# Altium PCB PCB1.PcbDoc (part 1 of 3)
Units mm, origin at the board's own origin, x right, y up, seen from the top; angles counter-clockwise.
Board outline 161.54 x 169.48 mm, 4 copper layers (Top Layer, Layer 1, Layer 2, Bottom Layer), stack 0.603 mm thick; 181 components, 244 nets, 1695 pads, 188 vias.
Unrouted connection lines stored in the file: 630.
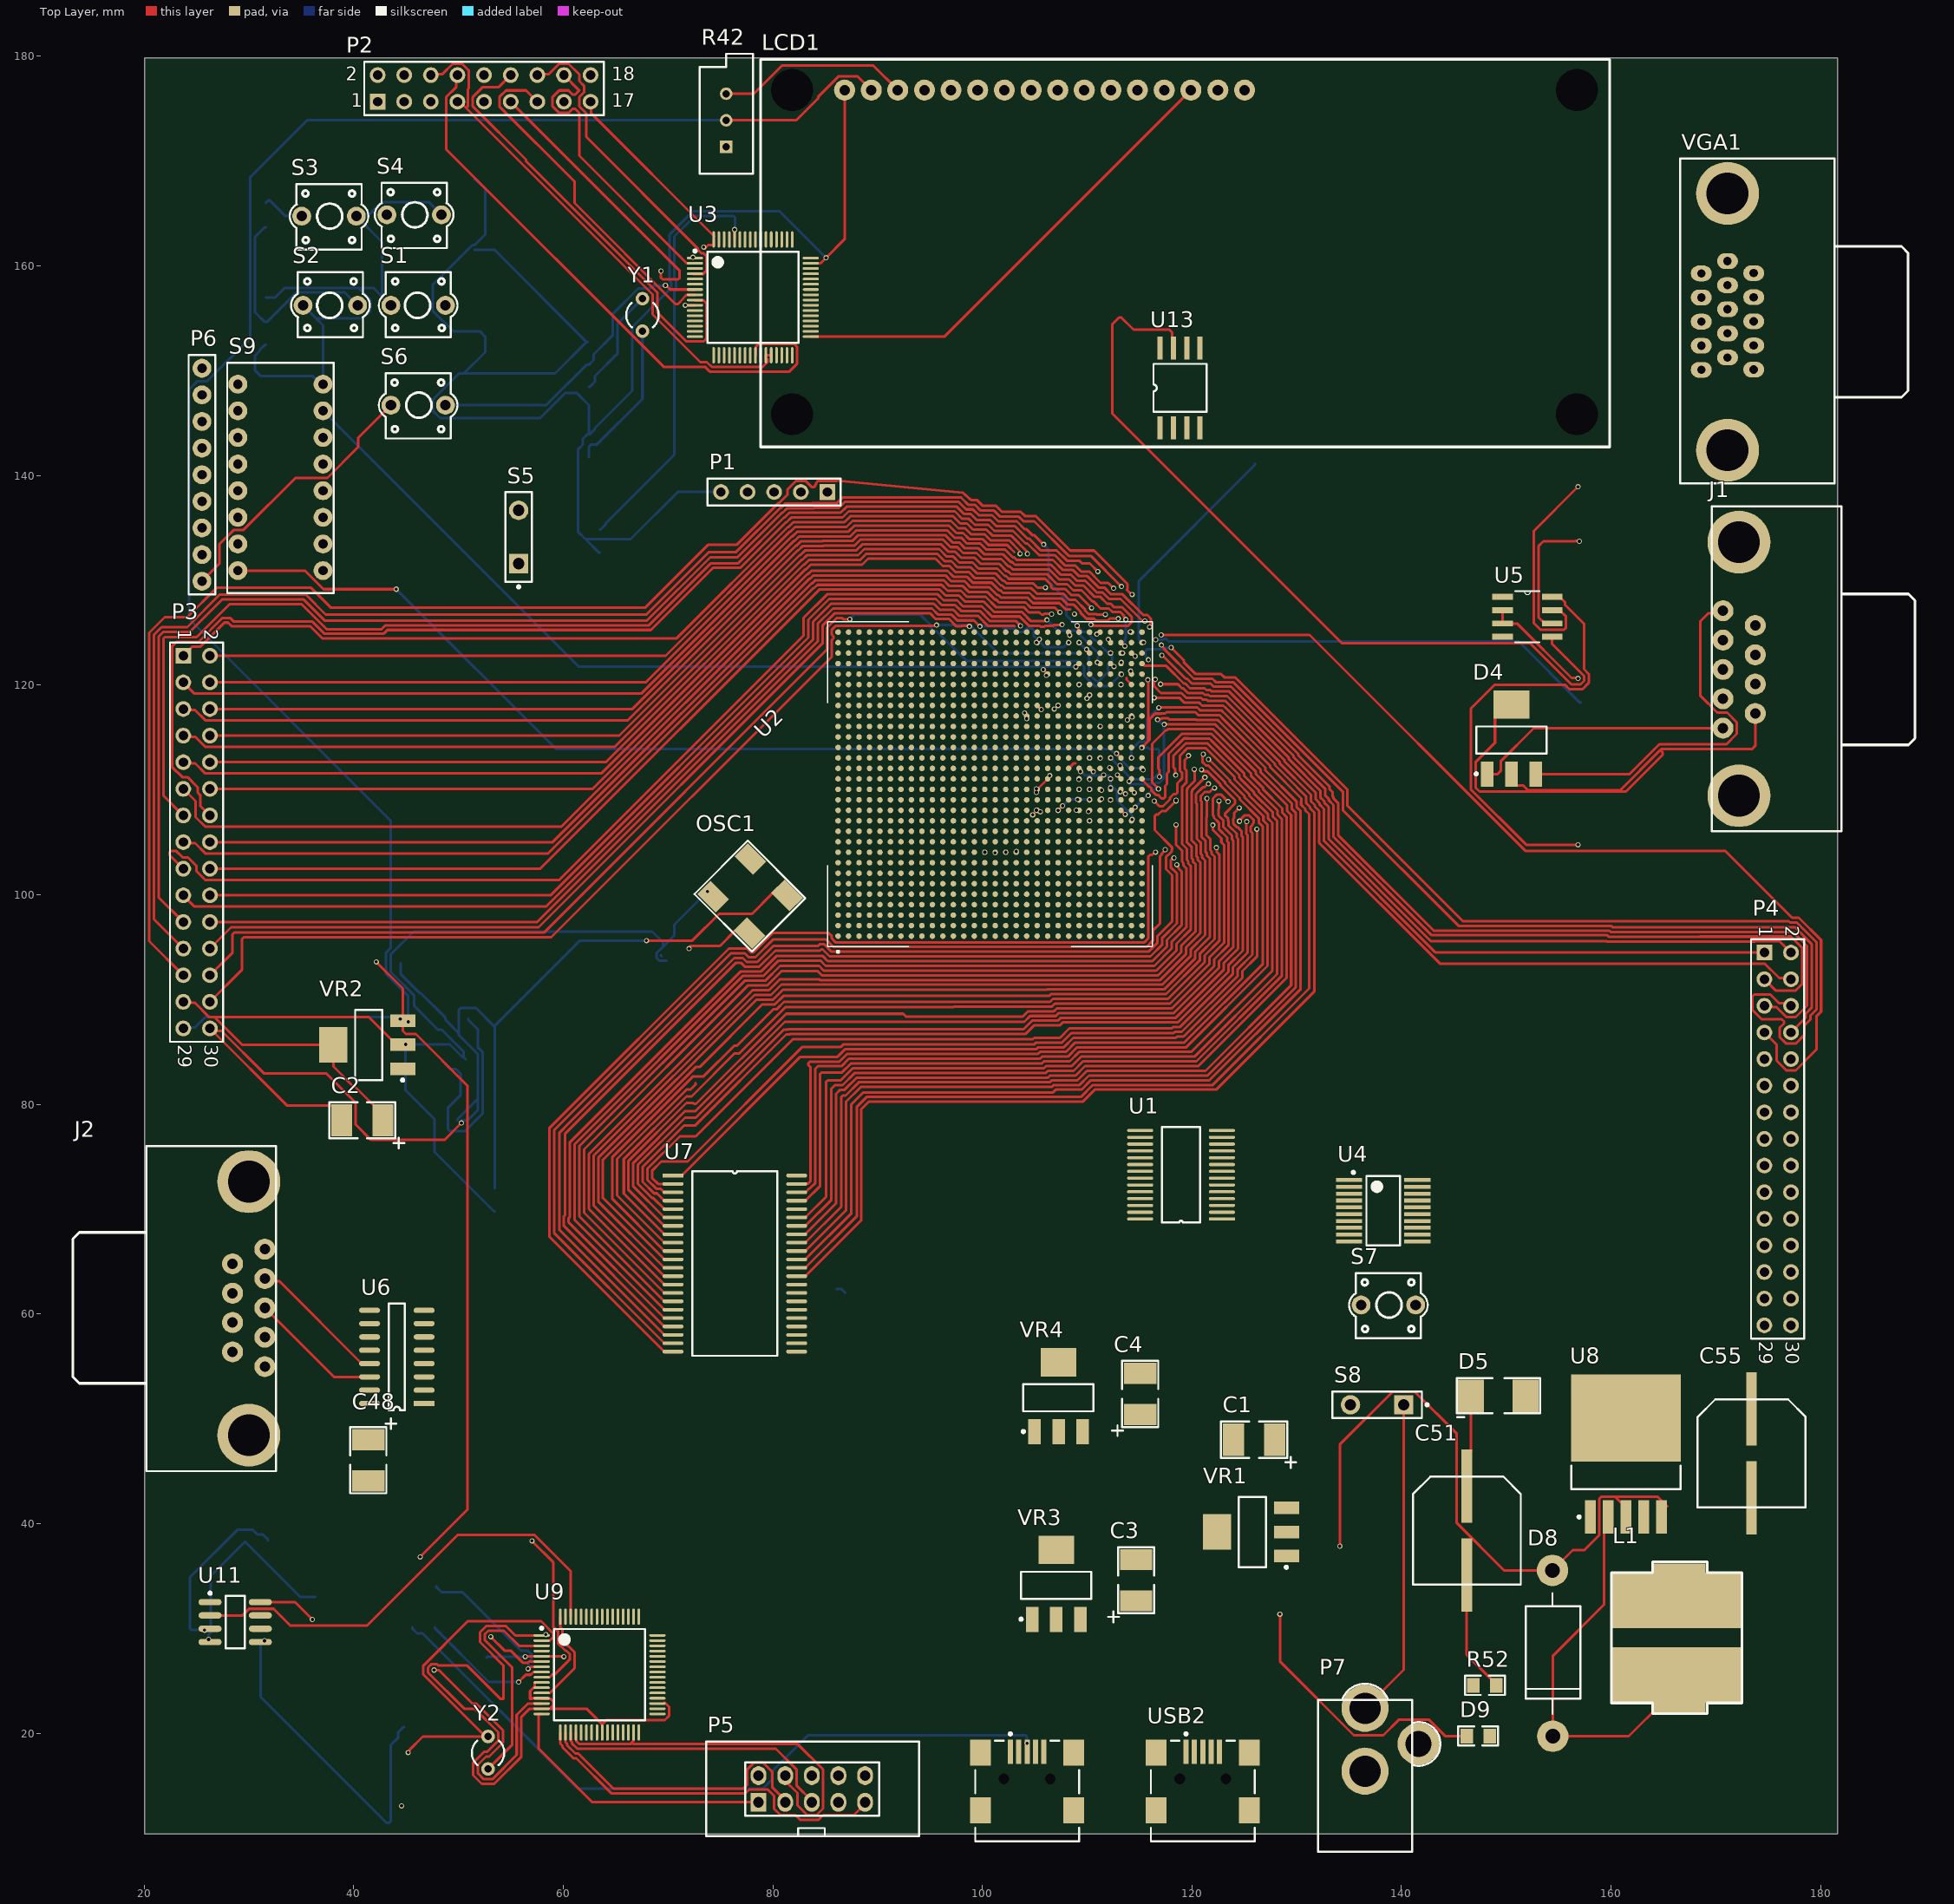
[diagram p0: Top Layer view]
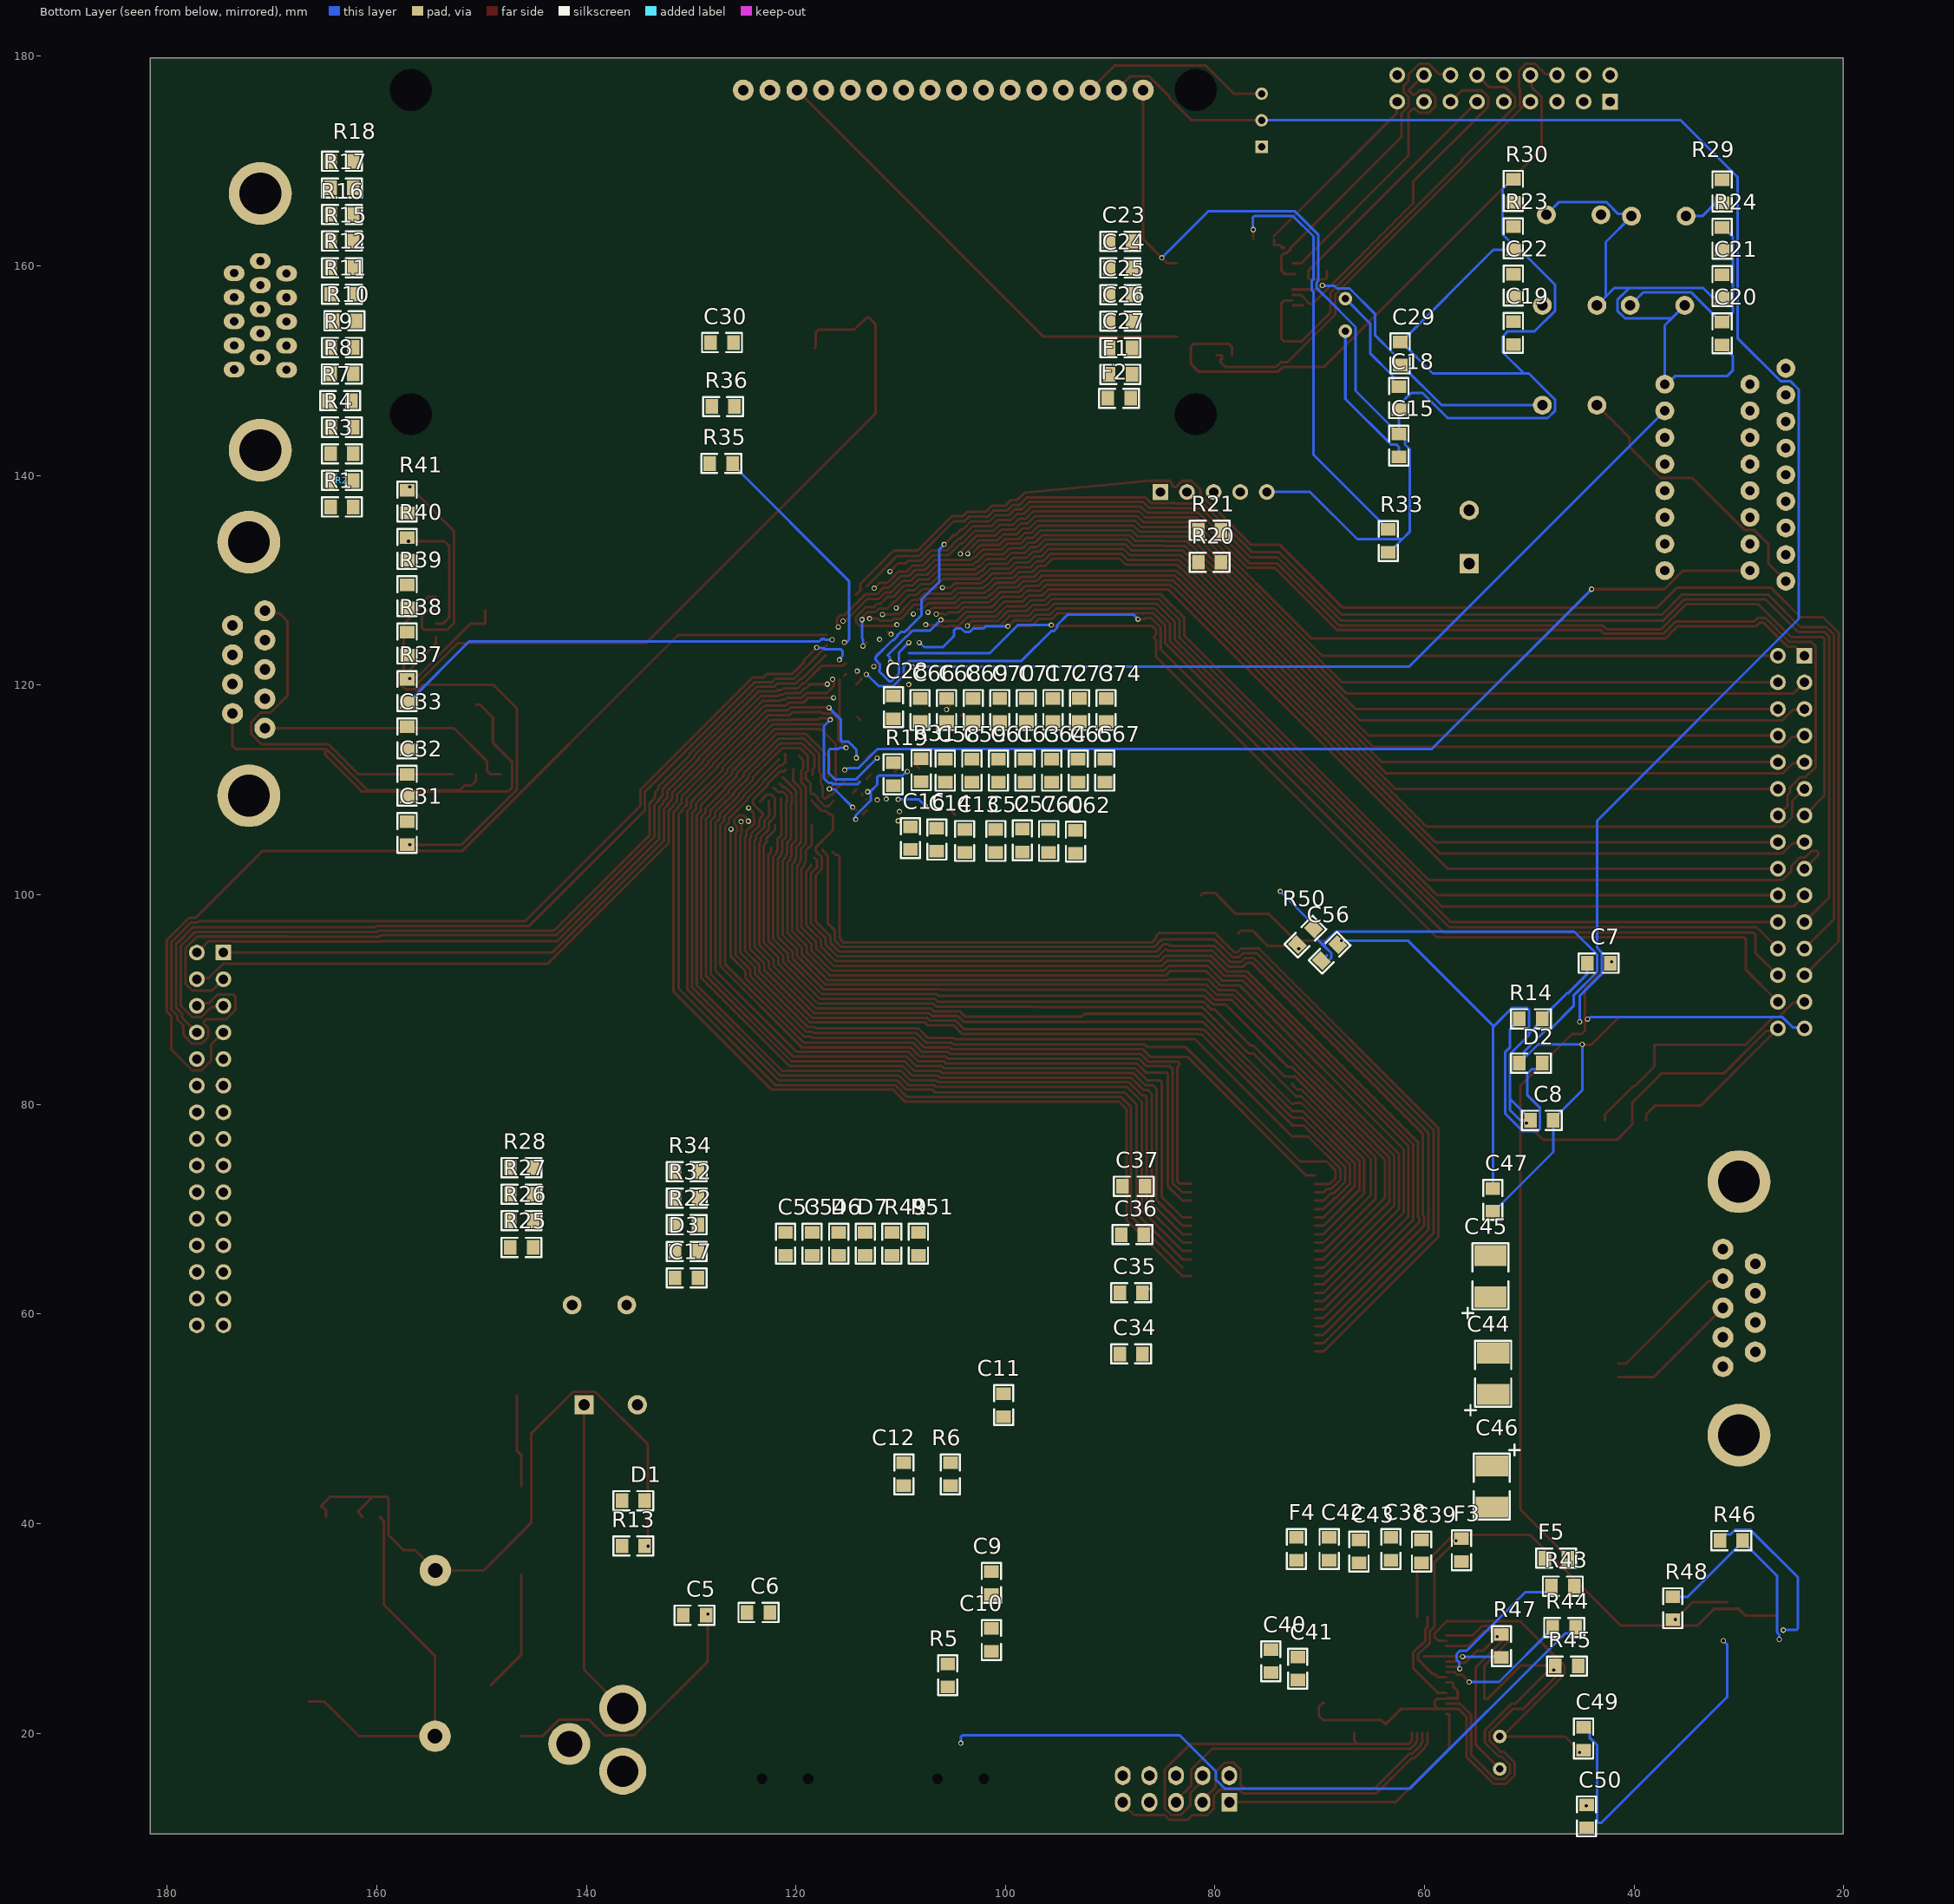
[diagram p1: Bottom Layer view, seen from below]
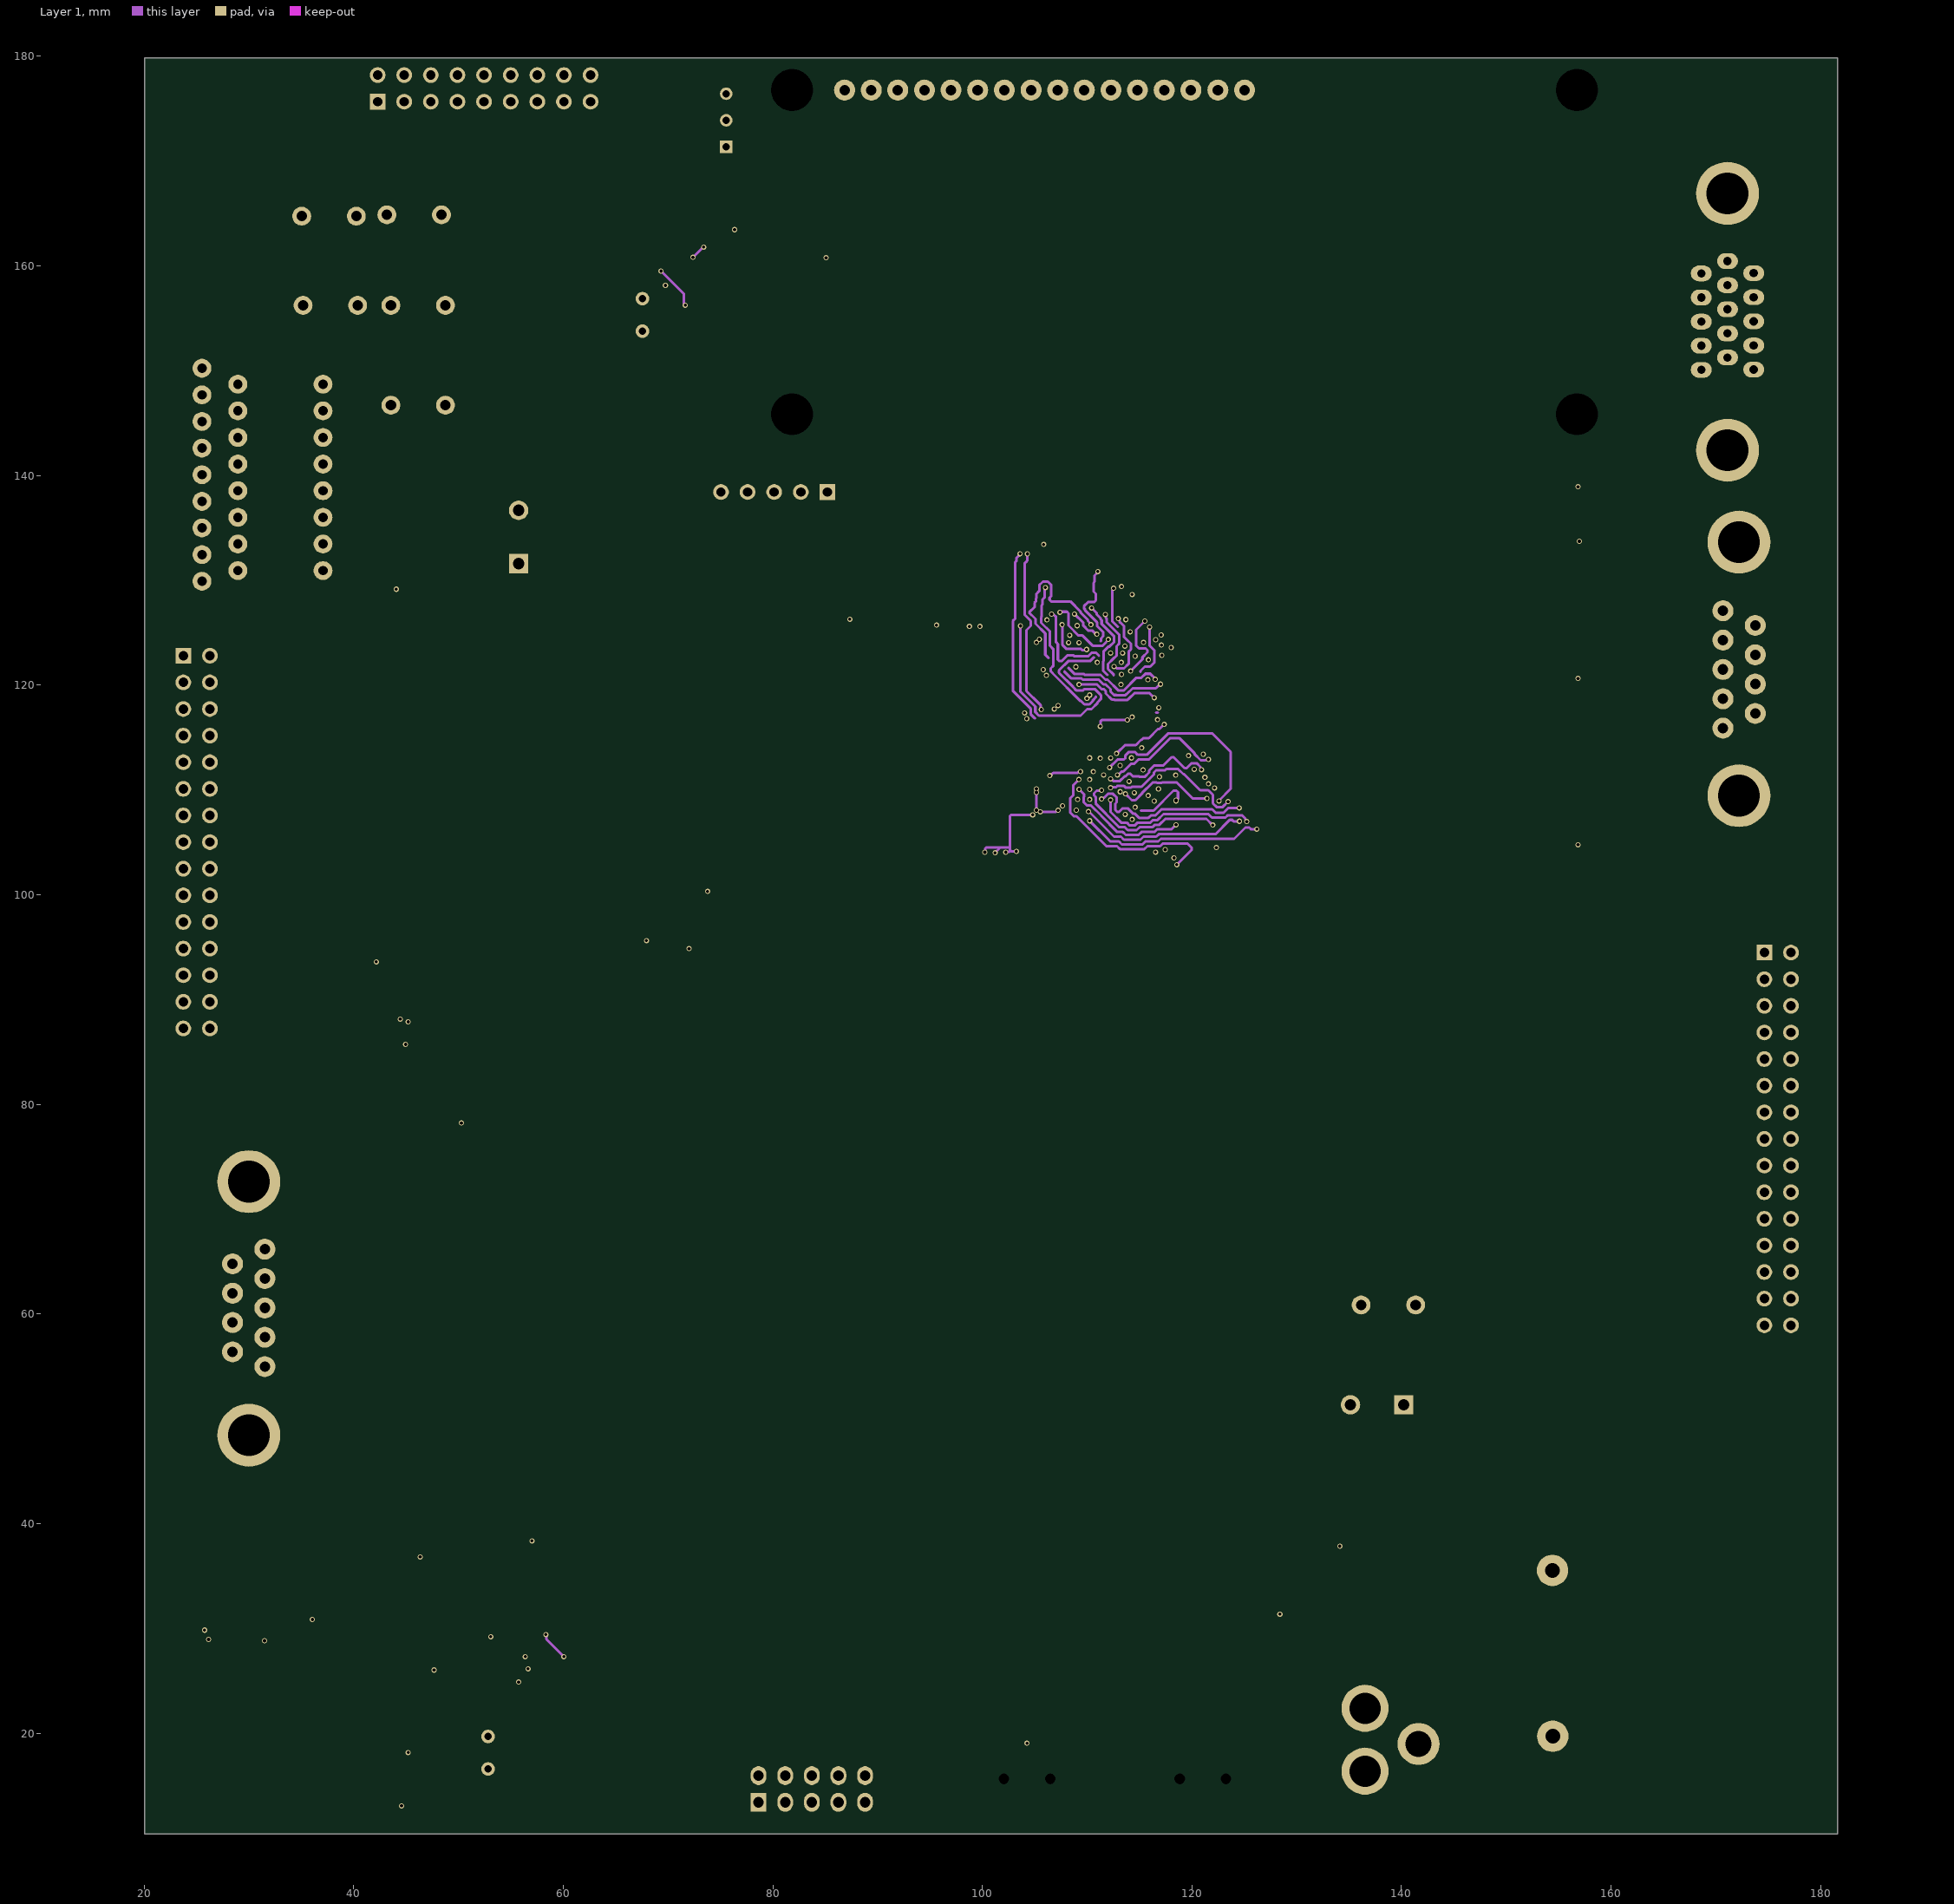
[diagram p2: Layer 1]
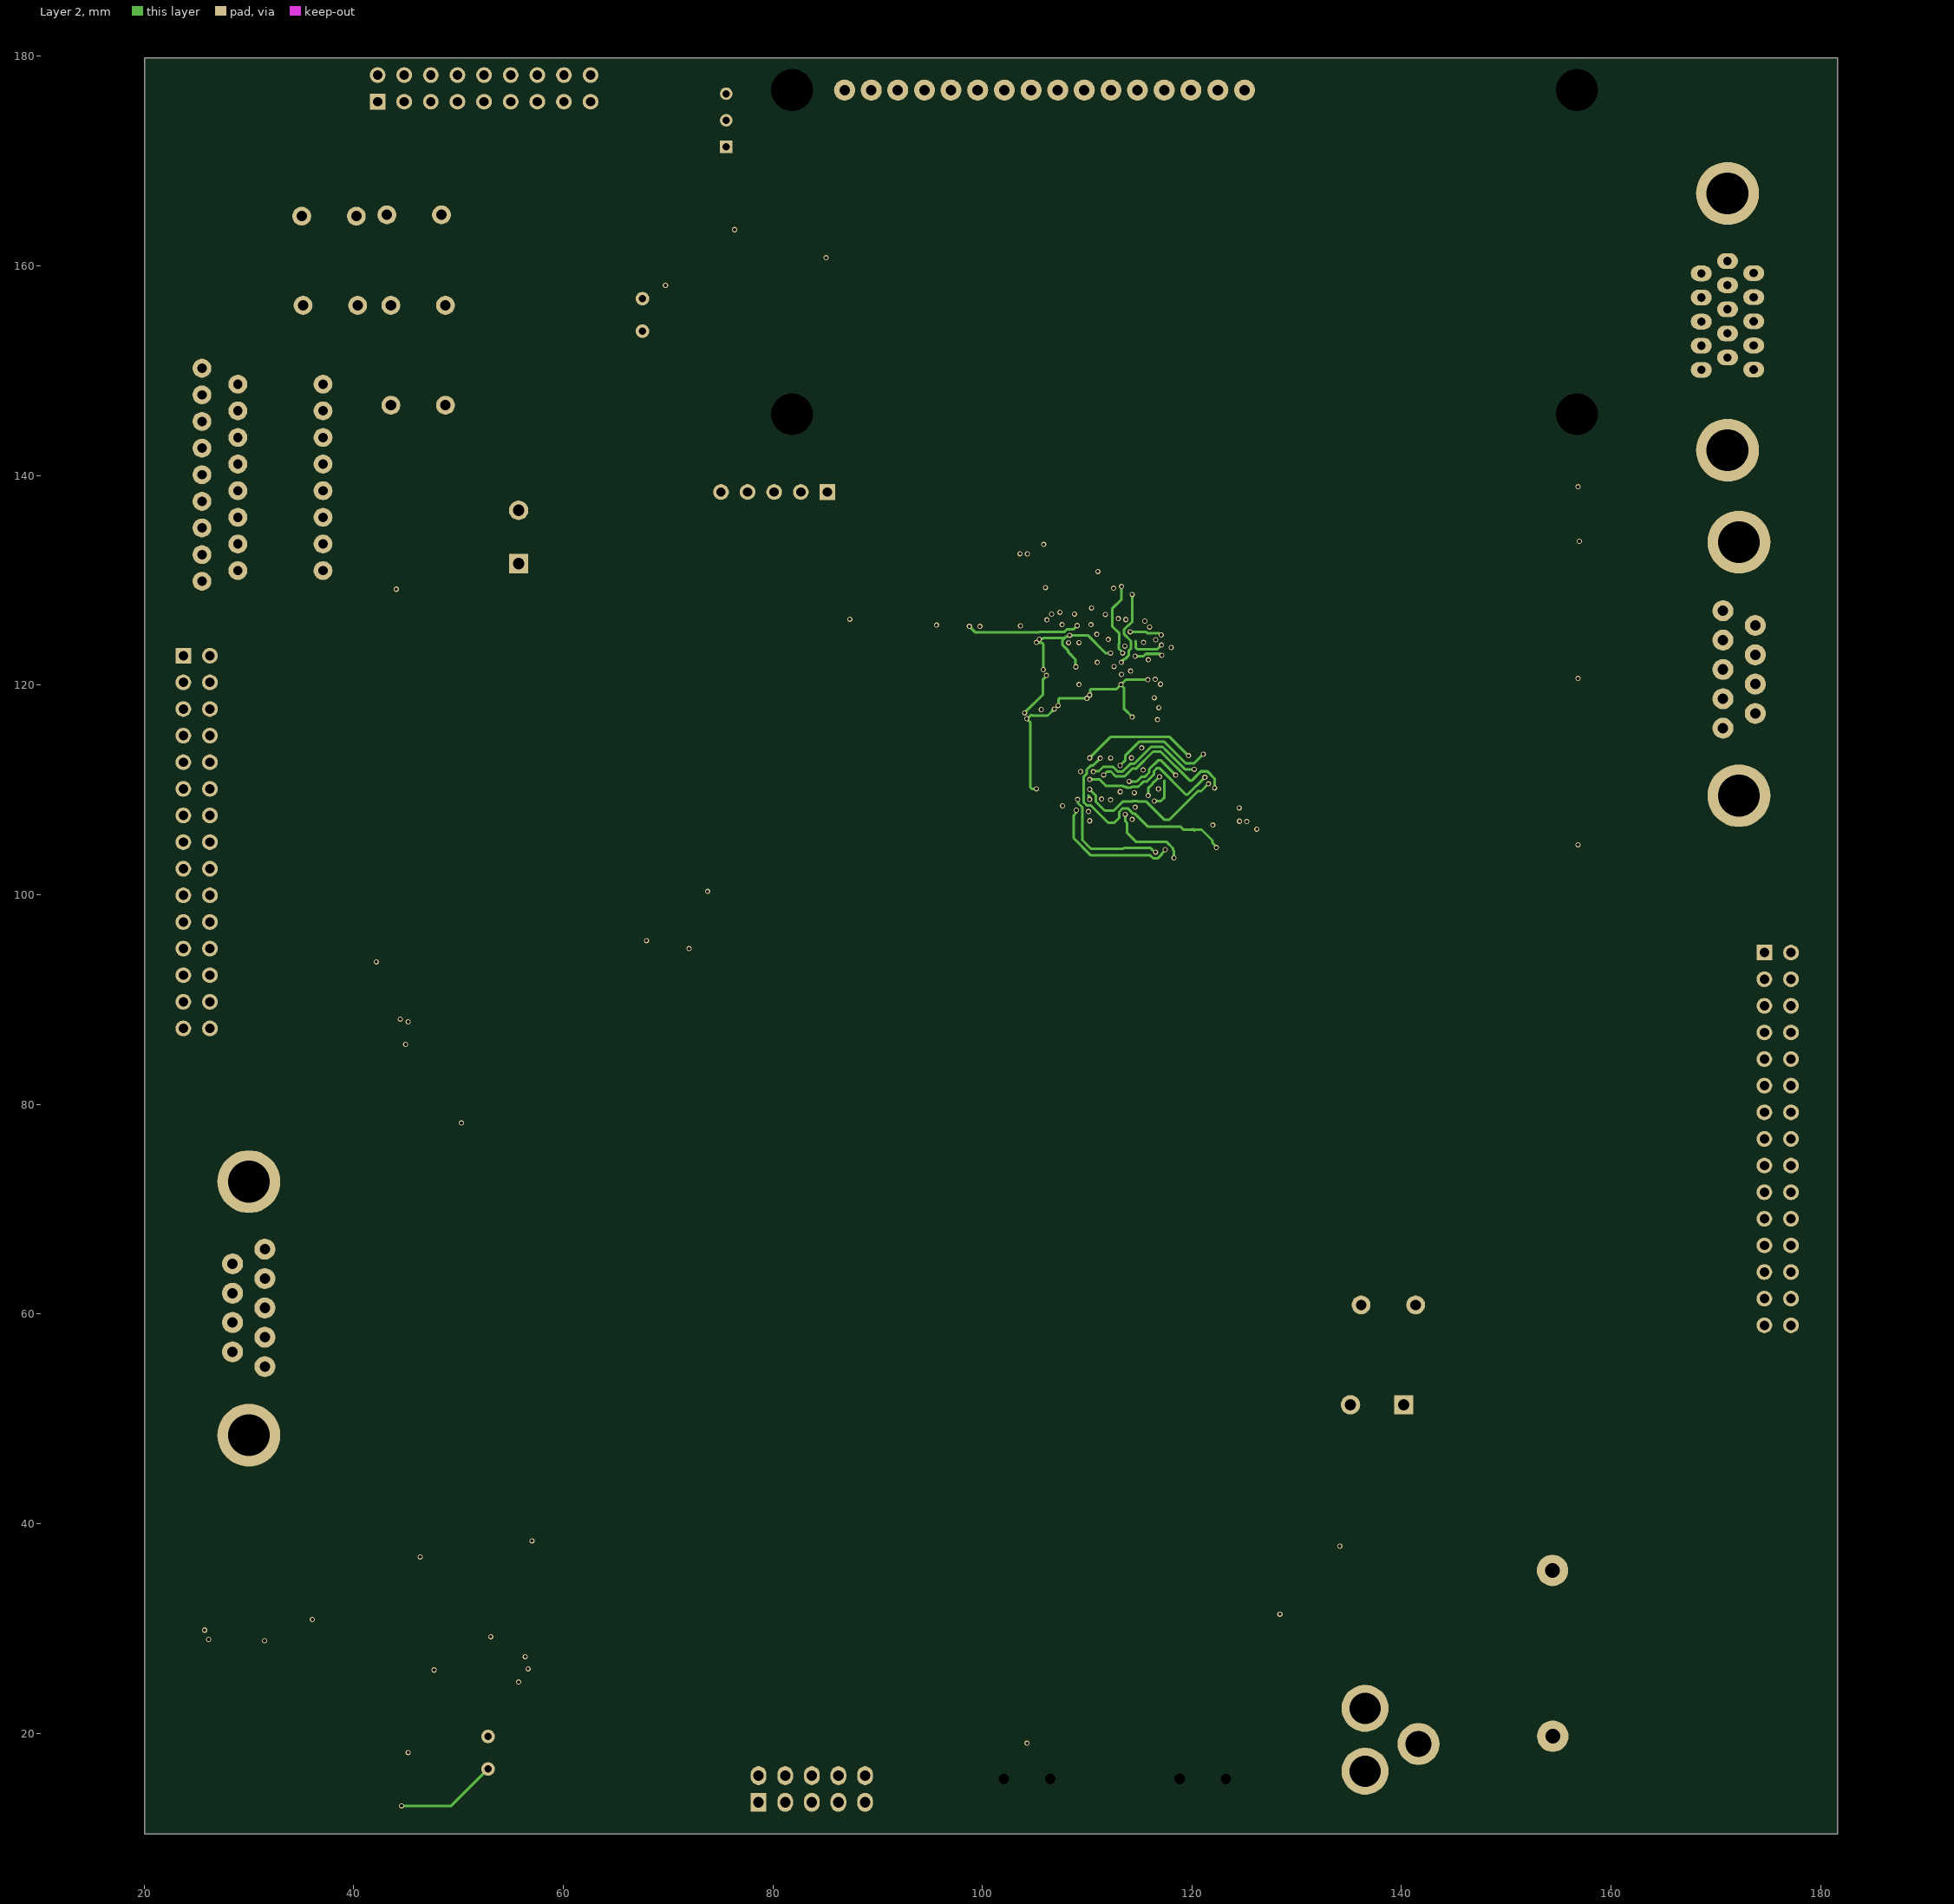
[diagram p3: Layer 2]

## Layer stack, top to bottom
Top Solder: solder mask 0.0102, Solder Resist, Dk 3.5
Top Layer: signal copper 0.0356
Dielectric 2: prepreg 0.0711, PP-006, Dk 4.1
Layer 1: signal copper 0.035
Dielectric 1: dielectric 0.32, FR-4, Dk 4.8
Layer 2: signal copper 0.035
Dielectric 3: prepreg 0.0711, PP-006, Dk 4.1
Bottom Layer: signal copper 0.0356
Bottom Solder: solder mask 0.0102, Solder Resist, Dk 3.5

## Board outline
20.066,10.382 181.61,10.382 181.61,179.864 20.066,179.864

## Design rules (kind name [scope] priority, off if disabled: settings)
Clearance [All] p1: gap=0.2 ignorepadtopadclearanceinfootprint=FALSE
PolygonConnect [All] p1: connectstyle=Relief reliefconductorwidth=0.254 reliefentries=4 polygonreliefangle="90 Angle" airgapwidth=0.254
RoutingVias [All] p1: holewidth=0.3 width=0.5 viastyle="Through Hole" minholewidth=0.3 minwidth=0.5 maxholewidth=0.6 maxwidth=1
SolderMaskExpansion [All] p1: expansion=0.102 istentingtop=FALSE
SupplyNets "Schematic Supply Nets_8" [InNet('GND')] p1: voltage=0.000
SupplyNets "Schematic Supply Nets_7" [InNet('3V3')] p2: voltage=0.000
SupplyNets "Schematic Supply Nets_6" [InNet('1V8')] p3: voltage=0.000
SupplyNets "Schematic Supply Nets_5" [InNet('GNDA')] p4: voltage=0.000
SupplyNets "Schematic Supply Nets_4" [InNet('3V3A')] p5: voltage=0.000
SupplyNets "Schematic Supply Nets_3" [InNet('5V0')] p6: voltage=0.000
SupplyNets "Schematic Supply Nets_2" [InNet('1V2')] p7: voltage=0.000
SupplyNets "Schematic Supply Nets_1" [InNet('5')] p8: voltage=0.000
SupplyNets "Schematic Supply Nets" [InNet('2V5')] p9: voltage=0.000
Width [All] p1: maxlimit=2 minlimit=0.25 preferedwidth=0.25 minimp=50.000000 maximp=50.000000 favimp=50.000000
30 further rules are at their usual default settings.

## Components (designator, comment, footprint, x,y, rotation, side; value= is the part's Value field where it differs from the comment)
C1 "Cap Pol2" C_B 125.857,48.006 r90 top value=100uF
C2 "Cap Pol2" C_B 40.758,78.488 r90 top value=100uF
C3 "Cap Pol2" C_B 114.681,34.671 r0 top value=100uF
C4 "Cap Pol2" C_B 115.062,52.451 r0 top value=100uF
C5 "Cap" SMD_805 129.667,31.242 r90 bottom value=100pF
C6 "Cap" SMD_805 123.571,31.496 r90 bottom value=100nF
C7 "Cap" SMD_805 43.383,93.447 r90 bottom value=100pF
C8 "Cap" SMD_805 48.819,78.461 r90 bottom value=100nF
C9 "Cap" SMD_805 101.371,34.341 r180 bottom value=100pF
C10 "Cap" SMD_805 101.371,28.905 r180 bottom value=100nF
C11 "Cap" SMD_805 100.203,51.308 r180 bottom value=100pF
C12 "Cap" SMD_805 109.728,44.704 r180 bottom value=100nF
C13 "Cap" SMD_805 103.911,105.137 r180 bottom value=47uF
C14 "Cap" SMD_805 106.578,105.264 r180 bottom value=47uF
C15 "Cap" SMD_805 62.484,142.872 r180 bottom value=18pF
C16 "Cap" SMD_805 109.093,105.41 r180 bottom value=47uF
C17 "Cap" SMD_805 130.429,63.418 r90 bottom value=100nF
C18 "Cap" SMD_805 62.484,147.39 r180 bottom value=18pF
C19 "Cap" SMD_805 51.562,153.61 r180 bottom value=100pF
C20 "Cap" SMD_805 31.648,153.559 r180 bottom value=100pF
C21 "Cap" SMD_805 31.648,158.077 r180 bottom value=100pF
C22 "Cap" SMD_805 51.562,158.128 r180 bottom value=100pF
C23 "Cap" SMD_805 89.027,162.319 r90 bottom value=100nF
C24 "Cap" SMD_805 89.027,159.782 r90 bottom value=100nF
C25 "Cap" SMD_805 89.027,157.245 r90 bottom value=100nF
C26 "Cap" SMD_805 89.027,154.708 r90 bottom value=100nF
C27 "Cap" SMD_805 89.027,152.171 r90 bottom value=100pF
C28 "Cap" SMD_805 110.718,117.888 r180 bottom value=47uF
C29 "Cap" SMD_805 62.357,151.654 r180 bottom value=100nF
C30 "Cap" SMD_805 127.051,152.66 r90 bottom value=100pF
C31 "Cap" SMD_805 157.124,105.896 r180 bottom value=100nF
C32 "Cap" SMD_805 157.124,110.414 r180 bottom value=100pF
C33 "Cap" SMD_805 157.124,114.932 r180 bottom value=100pF
C34 "Cap" SMD_805 88.011,56.166 r90 bottom value=100pF
C35 "Cap" SMD_805 88.011,62.008 r90 bottom value=100pF
C36 "Cap" SMD_805 87.884,67.596 r270 bottom value=100pF
C37 "Cap" SMD_805 87.757,72.168 r90 bottom value=100pF
C38 "Cap" SMD_805 63.246,37.597 r180 bottom value=4.7uF
C39 "Cap" SMD_805 60.325,37.343 r180 bottom value=100nF
C40 "Cap" SMD_805 74.701,26.878 r180 bottom value=4.7uF
C41 "Cap" SMD_805 72.136,26.167 r180 bottom value=100nF
C42 "Cap" SMD_805 69.088,37.597 r0 bottom value=4.7uF
C43 "Cap" SMD_805 66.294,37.343 r180 bottom value=100nF
C44 "Cap Pol2" C_B 53.467,54.388 r180 bottom value=1uF
C45 "Cap Pol2" C_B 53.719,63.668 r180 bottom value=1uF
C46 "Cap Pol2" C_B 53.594,43.466 r0 bottom value=1uF
C47 "Cap" SMD_805 53.467,70.898 r0 bottom value=100nF
C48 "Cap Pol2" C_B 41.402,45.974 r180 top value=1uF
C49 "Cap" SMD_805 44.856,19.487 r180 bottom value=22pF
C50 "Cap" SMD_805 44.577,12.07 r180 bottom value=22pF
C51 "Cap" C_CYL_SMD 146.304,39.529 r90 top value=100nF
C52 "Cap" SMD_805 100.955,105.137 r180 bottom value=47uF
C53 "Cap" SMD_805 121.015,66.707 r180 bottom value=100nF
C54 "Cap" SMD_805 118.478,66.707 r180 bottom value=100nF
C55 "Cap" C_CYL_SMD 173.482,46.895 r90 top value=1000uF
C56 "Cap" SMD_805 69.088,94.488 r225 bottom value=100nF
C57 "Cap" SMD_805 98.419,105.188 r180 bottom value=47uF
C58 "Cap" SMD_805 105.772,111.846 r180 bottom value=0.47uF
C59 "Cap" SMD_805 103.235,111.846 r180 bottom value=0.47uF
C60 "Cap" SMD_805 95.91,105.137 r180 bottom value=0.47uF
C61 "Cap" SMD_805 100.698,111.846 r180 bottom value=0.47uF
C62 "Cap" SMD_805 93.345,105.061 r180 bottom value=4.7uF
C63 "Cap" SMD_805 98.161,111.846 r180 bottom value=4.7uF
C64 "Cap" SMD_805 95.625,111.846 r180 bottom value=100uF
C65 "Cap" SMD_805 93.088,111.846 r180 bottom value=4.7uF
C66 "Cap" SMD_805 108.182,117.634 r180 bottom value=680uF
C67 "Cap" SMD_805 90.551,111.846 r180 bottom value=680uF
C68 "Cap" SMD_805 105.645,117.634 r180 bottom value=4.7uF
C69 "Cap" SMD_805 103.108,117.634 r180 bottom value=680uF
C70 "Cap" SMD_805 100.571,117.634 r180 bottom value=680uF
C71 "Cap" SMD_805 98.034,117.634 r180 bottom value=0.47uF
C72 "Cap" SMD_805 95.498,117.634 r180 bottom value=4.7uF
C73 "Cap" SMD_805 92.961,117.634 r180 bottom value=100uF
C74 "Cap" SMD_805 90.424,117.634 r180 bottom value=100uF
D1 "LED0" SMD_805 135.509,42.164 r90 bottom
D2 "LED0" SMD_805 49.86,83.922 r90 bottom
D3 "LED0" SMD_805 130.429,65.954 r90 bottom
D4 "CDSOT23-SM712" SOT223 150.529,114.814 r0 top
D5 "1N4001" TVS 149.225,52.229 r90 top
D6 "LED0" SMD_805 115.941,66.707 r180 bottom
D7 "LED0" SMD_805 113.405,66.707 r180 bottom
D8 "1N5822" 1N5822 155.677,19.336 r90 top
D9 "LED0" SMD_805 147.32,19.717 r90 top
F1 "Ferrite Bead" SMD_805 89.027,149.635 r90 bottom value=10mH
F2 "Ferrite Bead" SMD_805 89.154,147.352 r90 bottom value=10mH
F3 "Ferrite Bead" SMD_805 56.515,37.47 r180 bottom value=10mH
F4 "Ferrite Bead" SMD_805 72.263,37.597 r180 bottom value=10mH
F5 "Ferrite Bead" SMD_805 47.447,36.682 r90 bottom value=10mH
J1 "D Connector 9" COM_3d 179.324,119.253 r90 top
J2 "D Connector 9" COM_3d 22.885,62.838 r270 top
L1 "Inductor" INDUC_SMD 165.989,29.115 r90 top value="100uH 3A"
LCD1 "LCD" LCD2x16_3d 135.403,162.059 r0 top
OSC1 "OSC_SMD" OSC_SMD 78.013,94.596 r45 top
P1 "SWD Micro" HEADER5x1 86.487,137.16 r270 top
P2 "Header 9X2" HEADER10x2 41.021,174.403 r90 top
P3 "Header 15X2" HEADER15x2 22.479,124.079 r0 top
P4 "Header 15X2" HEADER15x2 173.355,95.758 r0 top
P5 "Header 5X2H" BOX2x5_3D 83.693,14.764 r180 top
P6 "Array 10K" ARRAY_RES 24.384,151.384 r0 top
P7 "Header 2" ADAP_JACK 141.025,8.683 r90 top
R1 "Res1" SMD_805 163.322,136.979 r90 bottom value=510
R2 "Res1" SMD_805 163.322,139.516 r90 bottom value=1K
R3 "Res1" SMD_805 163.322,142.053 r90 bottom value=2K
R4 "Res1" SMD_805 163.322,144.59 r90 bottom value=4K
R5 "Res1" SMD_805 105.537,25.527 r180 bottom value=100
R6 "Res1" SMD_805 105.283,44.704 r180 bottom value=100
R7 "Res1" SMD_805 163.5,147.127 r90 bottom value=1K
R8 "Res1" SMD_805 163.322,149.663 r90 bottom value=510
R9 "Res1" SMD_805 163.322,152.2 r90 bottom value=1K
R10 "Res1" SMD_805 163.068,154.737 r90 bottom value=1K
R11 "Res1" SMD_805 163.322,157.274 r90 bottom value=2K
R12 "Res1" SMD_805 163.322,159.811 r90 bottom value=4K
R13 "Res1" SMD_805 135.509,37.846 r90 bottom value=1.5K
R14 "Res1" SMD_805 49.86,88.138 r90 bottom value=1.5K
R15 "Res1" SMD_805 163.322,162.347 r90 bottom value=510
R16 "Res1" SMD_805 163.322,164.884 r90 bottom value=1K
R17 "Res1" SMD_805 163.322,167.421 r90 bottom value=2K
R18 "Res1" SMD_805 163.322,169.958 r90 bottom value=4K
R19 "Res1" SMD_805 110.744,111.506 r180 bottom value=1K
R20 "Res1" SMD_805 80.518,131.699 r90 bottom value=10K
R21 "Res1" SMD_805 80.518,134.747 r90 bottom value=10K
R22 "Res1" SMD_805 130.429,68.542 r270 bottom value=100
R23 "Res1" SMD_805 51.511,162.646 r0 bottom value=2.2K
R24 "Res1" SMD_805 31.598,162.595 r0 bottom value=2.2K
R25 "Res1" SMD_805 146.177,66.386 r270 bottom value=4.7K
R26 "Res1" SMD_805 146.177,68.923 r270 bottom value=4.7K
R27 "Res1" SMD_805 146.177,71.46 r270 bottom value=4.7K
R28 "Res1" SMD_805 146.177,73.946 r90 bottom value=4.7K
R29 "Res1" SMD_805 31.648,167.113 r180 bottom value=2.2K
R30 "Res1" SMD_805 51.562,167.164 r180 bottom value=2.2K
R31 "Res1" SMD_805 108.077,111.887 r180 bottom value=10K
R32 "Res1" SMD_805 130.429,71.028 r90 bottom value=100
R33 "Res1" SMD_805 63.5,133.763 r180 bottom value=10K
R34 "Res1" SMD_805 130.429,73.565 r90 bottom value=100
R35 "Res1" SMD_805 127.127,141.129 r90 bottom value=4.7K
R36 "Res1" SMD_805 126.949,146.564 r90 bottom value=4.7K
R37 "Res1" SMD_805 157.124,119.45 r180 bottom value=10K
R38 "Res1" SMD_805 157.124,123.968 r180 bottom value=0
R39 "Res1" SMD_805 157.124,128.486 r180 bottom value=120
R40 "Res1" SMD_805 157.124,133.004 r180 bottom value=20
R41 "Res1" SMD_805 157.124,137.522 r180 bottom value=20
R42 "RPot" VR5 75.565,173.895 r90 top value=1K
R43 "Res1" SMD_805 46.812,34.015 r90 bottom value=27
R44 "Res1" SMD_805 46.685,30.078 r90 bottom value=27
R45 "Res1" SMD_805 46.431,26.395 r90 bottom value=1K
R46 "Res1" SMD_805 30.734,38.359 r90 bottom value=2.2K
R47 "Res1" SMD_805 52.705,28.326 r180 bottom value=12K
R48 "Res1" SMD_805 36.347,31.933 r180 bottom value=10K
R49 "Res1" SMD_805 110.868,66.707 r180 bottom value=1K
R50 "Res1" SMD_805 71.366,95.984 r45 bottom value=10K
R51 "Res1" SMD_805 108.331,66.707 r180 bottom value=1K
R52 "Res1" SMD_805 147.955,24.543 r90 top value=2K
S1 "SW-PB" RES_B 46.101,156.242 r180 top
S2 "SW-PB" RES_B 37.719,156.242 r180 top
S3 "SW-PB" RES_B 37.719,164.751 r0 top
S4 "SW-PB" RES_B 45.847,164.878 r0 top
S5 "SW-SPST" SPST-2 55.753,134.144 r90 top
S6 "SW-PB" RES_B 46.228,146.717 r0 top
S7 "SW-PB" RES_B 138.811,60.865 r0 top
S8 "SW-SPST" SPST-2 137.668,51.34 r180 top
S9 "SW DIP-8" ARRAY_KEY8 33.401,139.7 r0 top
U1 "FT232RL" FT232RL 118.925,68.819 r0 top
U2 "XC7Z045-2FFG900I" IC_XC7Z045-2FFG900I 100.733,110.562 r90 top
U3 "STM32F103RBT6" LQFP64_L 78.105,157.004 r0 top
U4 "XCF02SVO20C" XCF02S 138.305,69.932 r0 top
U5 "MAX485ESA+T" SOIC127P600X175-8N 152.019,126.524 r0 top
U6 "MAX3232CPE" max3232 43.554,50.959 r180 top
U7 "IS61LV25616AL" IS61LV256 76.454,65.151 r0 top
U8 "LM2576HVT-5.0LF03" LM2576_SMD 161.417,49.689 r0 top
U9 "FT2232HL-Reel" LQFP64_L 63.472,25.596 r0 top
U11 "93LC46A-E/SN" SOIC-SN8_N 28.702,30.612 r0 top
U13 "24C512" 24C512 118.999,148.318 r90 top
USB1 "MICRO_USB" MINI_USB_NEW 104.14,15.621 r180 top
USB2 "MICRO_USB" MINI_USB_NEW 120.904,15.621 r180 top
VGA1 "Connector 15" VGA_PORT 176.809,154.914 r90 top
VR1 "Voltage Regulator" SOT223 125.73,39.243 r90 top
VR2 "Voltage Regulator" SOT223 41.402,85.725 r90 top
VR3 "Voltage_Reg_Fan" SOT223 107.095,34.163 r0 top
VR4 "Voltage_Reg_Fan" SOT223 107.315,52.07 r0 top
Y1 "14.7456 MHz" BCY-W2/D3.1 67.564,155.327 r0 top
Y2 "12MHz" BCY-W2/D3.1 52.832,18.14 r0 top

## Footprints (in the part's own frame and the unit in brackets; to place one, negate y for a bottom-side part, rotate by r counter-clockwise, add the part's x,y. Pads: shape width x height; smd on the part's side, far side on the other; paste and mask are expansions set on the pad)
1N5822 [mm]
  round 3 hole 1.4: 1(16.205,1.27) 2(0.381,1.245)
  silkscreen extent 2.51,-1.4 14.05,3.81, body extent -0.13,-1.5 16.72,3.89, height 5.33
24C512 [mm]
  rect 2.2x0.5 smd: 1(-3.76,2.032) 2(-3.76,0.762) 3(-3.76,-0.508) 4(-3.76,-1.778) 5(3.856,-1.778) 6(3.856,-0.508) 7(3.856,0.762) 8(3.856,2.032)
  silkscreen extent -2.24,-2.41 2.34,2.67, body extent -3.77,-2.97 4.03,3.23, height 2
ADAP_JACK [mm]
  round 4.5 hole 3: 1(7.7,4.5) 2(13.7,4.5)
  round 4 hole 2.5: 1(10.3,-0.6)
  silkscreen extent 0,-2.68 16.04,9, body extent -0.1,-0.5 14.7,9, height 10
ARRAY_KEY8 [mm]
  round 1.8 hole 0.9: 1(-4.445,9.017) 2(-4.445,6.477) 3(-4.445,3.937) 4(-4.445,1.397) 5(-4.445,-1.143) 6(-4.445,-3.683) 7(-4.445,-6.223) 8(-4.445,-8.763) 9(3.683,-8.763) 10(3.683,-6.223) 11(3.683,-3.683) 12(3.683,-1.143) 13(3.683,1.397) 14(3.683,3.937) 15(3.683,6.477) 16(3.683,9.017)
  silkscreen extent -5.46,-10.92 4.7,11.05, body extent -5.46,-10.92 4.7,11.05, height 7.1
ARRAY_RES [mm]
  round 1.8 hole 0.9: 1(1.143,-21.463) 2(1.143,-18.923) 3(1.143,-16.383) 4(1.143,-13.843) 5(1.143,-11.303) 6(1.143,-8.763) 7(1.143,-6.223) 8(1.143,-3.683) 9(1.143,-1.143)
  silkscreen extent -0.13,-22.73 2.41,0.13, body extent -0.08,-22.68 2.41,0.13, height 2.95
BCY-W2/D3.1 [mm]
  round 1.3 hole 0.7: 1(0,1.55) 2(0,-1.55)
  silkscreen extent -1.55,-1.19 1.55,1.17
BOX2x5_3D [mm]
  rect 1.5x1.8 hole 1: 1(5.047,1.346)
  oval 1.5x1.8 hole 1: 2(5.047,-1.194) 3(2.507,1.346) 4(2.507,-1.194) 5(-0.033,1.346) 6(-0.033,-1.194) 7(-2.573,1.346) 8(-2.573,-1.194) 9(-5.113,1.346) 10(-5.113,-1.194)
  silkscreen extent -10.29,-4.45 10.03,4.57, body extent -10.41,-4.57 10.16,4.7, height 8
C_B [mm]
  rect 3.1x2 smd: 1(-0.002,-2.041) 2(-0.002,1.896)
  Top Layer pour cut-out: -1.829,0.889 -1.829,-3.327 1.829,-3.327 1.829,0.889
  silkscreen extent -2.67,-4.07 1.73,3.07, body extent -1.4,-1.78 1.4,1.78, height 2.23
C_CYL_SMD [mm]
  rect 7x1 smd: 1(4.039,0.076) 2(-4.42,0.076)
  Top Layer pour cut-out: 0.457,5.255 0.457,-5.131 -6.909,-5.131 -6.909,5.227
  silkscreen extent -5.33,-5.08 4.97,5.22, body extent -5.33,-5.08 4.97,5.22, height 10
COM_3d [mm]
  round 2 hole 1: 1(-3.35,8.65) 2(-0.55,8.65) 3(2.25,8.65) 4(5.05,8.65) 5(7.85,8.65) 6(-1.95,5.563) 7(0.85,5.563) 8(3.65,5.563) 9(6.45,5.563)
  round 6 hole 4: 10(14.4,7.125) 11(-9.794,7.125)
  silkscreen extent -13.18,-9.67 17.83,9.72, body extent -13.27,-8.55 17.52,9.95, height 12.8
FT232RL [mm]
  rect 2.5x0.3 smd: 1(3.937,0.246)
  oval 2.5x0.3 smd: 2(3.937,0.896) 3(3.937,1.546) 4(3.937,2.196) 5(3.937,2.846) 6(3.937,3.496) 7(3.937,4.146) 8(3.937,4.796) 9(3.937,5.446) 10(3.937,6.096) 11(3.937,6.746) 12(3.937,7.396) 13(3.937,8.046) 14(3.937,8.696) 15(-3.863,8.696) 16(-3.863,8.046) 17(-3.863,7.396) 18(-3.863,6.746) 19(-3.863,6.096) 20(-3.863,5.446) 21(-3.863,4.796) 22(-3.863,4.146) 23(-3.863,3.496) 24(-3.863,2.846) 25(-3.863,2.196) 26(-3.863,1.546) 27(-3.863,0.896) 28(-3.863,0.246)
  silkscreen extent -1.78,-0.08 1.85,9.02, body extent -3.9,-0.65 3.9,9.54, height 2
HEADER5x1 [mm]
  rect 1.5x1.5 hole 0.9: 1(-1.27,-1.27)
  round 1.5 hole 0.9: 2(-1.27,-3.81) 3(-1.27,-6.35) 4(-1.27,-8.89) 5(-1.27,-11.43)
  silkscreen extent -2.54,-12.7 0,0, body extent -2.54,-12.7 0,0, height 9.43
HEADER10x2 [mm]
  rect 1.5x1.5 hole 0.9: 1(1.27,-1.27)
  round 1.5 hole 0.9: 2(3.81,-1.27) 3(1.27,-3.81) 4(3.81,-3.81) 5(1.27,-6.35) 6(3.81,-6.35) 7(1.27,-8.89) 8(3.81,-8.89) 9(1.27,-11.43) 10(3.81,-11.43) 11(1.27,-13.97) 12(3.81,-13.97) 13(1.27,-16.51) 14(3.81,-16.51) 15(1.27,-19.05) 16(3.81,-19.05) 17(1.27,-21.59) 18(3.81,-21.59)
  silkscreen extent 0,-22.86 5.08,0, body extent 0,-22.86 5.08,0, height 8.89
HEADER15x2 [mm]
  rect 1.5x1.5 hole 0.9: 1(1.27,-1.27)
  round 1.5 hole 0.9: 2(3.81,-1.27) 3(1.27,-3.81) 4(3.81,-3.81) 5(1.27,-6.35) 6(3.81,-6.35) 7(1.27,-8.89) 8(3.81,-8.89) 9(1.27,-11.43) 10(3.81,-11.43) 11(1.27,-13.97) 12(3.81,-13.97) 13(1.27,-16.51) 14(3.81,-16.51) 15(1.27,-19.05) 16(3.81,-19.05) 17(1.27,-21.59) 18(3.81,-21.59) 19(1.27,-24.13) 20(3.81,-24.13) 21(1.27,-26.67) 22(3.81,-26.67) 23(1.27,-29.21) 24(3.81,-29.21) 25(1.27,-31.75) 26(3.81,-31.75) 27(1.27,-34.29) 28(3.81,-34.29) 29(1.27,-36.83) 30(3.81,-36.83)
  silkscreen extent 0,-38.1 5.08,0, body extent 0,-38.1 5.08,0, height 8.89
IC_XC7Z045-2FFG900I [mm]
  round 0.53 smd mask+0.05: A1(-14.5,14.5) A2(-13.5,14.5) A3(-12.5,14.5) A4(-11.5,14.5) A5(-10.5,14.5) A6(-9.5,14.5) A7(-8.5,14.5) A8(-7.5,14.5) A9(-6.5,14.5) A10(-5.5,14.5) A11(-4.5,14.5) A12(-3.5,14.5) A13(-2.5,14.5) A14(-1.5,14.5) A15(-0.5,14.5) A16(0.5,14.5) A17(1.5,14.5) A18(2.5,14.5) A19(3.5,14.5) A20(4.5,14.5) A21(5.5,14.5) A22(6.5,14.5) A23(7.5,14.5) A24(8.5,14.5) A25(9.5,14.5) A26(10.5,14.5) A27(11.5,14.5) A28(12.5,14.5) A29(13.5,14.5) A30(14.5,14.5) AA1(-14.5,-5.5) AA2(-13.5,-5.5) AA3(-12.5,-5.5) AA4(-11.5,-5.5) AA5(-10.5,-5.5) AA6(-9.5,-5.5) AA7(-8.5,-5.5) AA8(-7.5,-5.5) AA9(-6.5,-5.5) AA10(-5.5,-5.5) AA11(-4.5,-5.5) AA12(-3.5,-5.5) AA13(-2.5,-5.5) AA14(-1.5,-5.5) AA15(-0.5,-5.5) AA16(0.5,-5.5) AA17(1.5,-5.5) AA18(2.5,-5.5) AA19(3.5,-5.5) AA20(4.5,-5.5) AA21(5.5,-5.5) AA22(6.5,-5.5) AA23(7.5,-5.5) AA24(8.5,-5.5) AA25(9.5,-5.5) AA26(10.5,-5.5) AA27(11.5,-5.5) AA28(12.5,-5.5) AA29(13.5,-5.5) AA30(14.5,-5.5) AB1(-14.5,-6.5) AB2(-13.5,-6.5) AB3(-12.5,-6.5) AB4(-11.5,-6.5) AB5(-10.5,-6.5) AB6(-9.5,-6.5) AB7(-8.5,-6.5) AB8(-7.5,-6.5) AB9(-6.5,-6.5) AB10(-5.5,-6.5) AB11(-4.5,-6.5) AB12(-3.5,-6.5) AB13(-2.5,-6.5) AB14(-1.5,-6.5) AB15(-0.5,-6.5) AB16(0.5,-6.5) AB17(1.5,-6.5) AB18(2.5,-6.5) AB19(3.5,-6.5) AB20(4.5,-6.5) AB21(5.5,-6.5) AB22(6.5,-6.5) AB23(7.5,-6.5) AB24(8.5,-6.5) AB25(9.5,-6.5) AB26(10.5,-6.5) AB27(11.5,-6.5) AB28(12.5,-6.5) AB29(13.5,-6.5) AB30(14.5,-6.5) AC1(-14.5,-7.5) AC2(-13.5,-7.5) AC3(-12.5,-7.5) AC4(-11.5,-7.5) AC5(-10.5,-7.5) AC6(-9.5,-7.5) AC7(-8.5,-7.5) AC8(-7.5,-7.5) AC9(-6.5,-7.5) AC10(-5.5,-7.5) AC11(-4.5,-7.5) AC12(-3.5,-7.5) AC13(-2.5,-7.5) AC14(-1.5,-7.5) AC15(-0.5,-7.5) AC16(0.5,-7.5) AC17(1.5,-7.5) AC18(2.5,-7.5) AC19(3.5,-7.5) AC20(4.5,-7.5) AC21(5.5,-7.5) AC22(6.5,-7.5) AC23(7.5,-7.5) AC24(8.5,-7.5) AC25(9.5,-7.5) AC26(10.5,-7.5) AC27(11.5,-7.5) AC28(12.5,-7.5) AC29(13.5,-7.5) AC30(14.5,-7.5) AD1(-14.5,-8.5) AD2(-13.5,-8.5) AD3(-12.5,-8.5) AD4(-11.5,-8.5) AD5(-10.5,-8.5) AD6(-9.5,-8.5) AD7(-8.5,-8.5) AD8(-7.5,-8.5) AD9(-6.5,-8.5) AD10(-5.5,-8.5) AD11(-4.5,-8.5) AD12(-3.5,-8.5) AD13(-2.5,-8.5) AD14(-1.5,-8.5) AD15(-0.5,-8.5) AD16(0.5,-8.5) AD17(1.5,-8.5) AD18(2.5,-8.5) AD19(3.5,-8.5) AD20(4.5,-8.5) AD21(5.5,-8.5) AD22(6.5,-8.5) AD23(7.5,-8.5) AD24(8.5,-8.5) AD25(9.5,-8.5) AD26(10.5,-8.5) AD27(11.5,-8.5) AD28(12.5,-8.5) AD29(13.5,-8.5) AD30(14.5,-8.5) AE1(-14.5,-9.5) AE2(-13.5,-9.5) AE3(-12.5,-9.5) AE4(-11.5,-9.5) AE5(-10.5,-9.5) AE6(-9.5,-9.5) AE7(-8.5,-9.5) AE8(-7.5,-9.5) AE9(-6.5,-9.5) AE10(-5.5,-9.5) AE11(-4.5,-9.5) AE12(-3.5,-9.5) AE13(-2.5,-9.5) AE14(-1.5,-9.5) AE15(-0.5,-9.5) AE16(0.5,-9.5) AE17(1.5,-9.5) AE18(2.5,-9.5) AE19(3.5,-9.5) AE20(4.5,-9.5) AE21(5.5,-9.5) AE22(6.5,-9.5) AE23(7.5,-9.5) AE24(8.5,-9.5) AE25(9.5,-9.5) AE26(10.5,-9.5) AE27(11.5,-9.5) AE28(12.5,-9.5) AE29(13.5,-9.5) AE30(14.5,-9.5) AF1(-14.5,-10.5) AF2(-13.5,-10.5) AF3(-12.5,-10.5) AF4(-11.5,-10.5) AF5(-10.5,-10.5) AF6(-9.5,-10.5) AF7(-8.5,-10.5) AF8(-7.5,-10.5) AF9(-6.5,-10.5) AF10(-5.5,-10.5) AF11(-4.5,-10.5) AF12(-3.5,-10.5) AF13(-2.5,-10.5) AF14(-1.5,-10.5) AF15(-0.5,-10.5) AF16(0.5,-10.5) AF17(1.5,-10.5) AF18(2.5,-10.5) AF19(3.5,-10.5) AF20(4.5,-10.5) AF21(5.5,-10.5) AF22(6.5,-10.5) AF23(7.5,-10.5) AF24(8.5,-10.5) AF25(9.5,-10.5) AF26(10.5,-10.5) AF27(11.5,-10.5) AF28(12.5,-10.5) AF29(13.5,-10.5) AF30(14.5,-10.5) AG1(-14.5,-11.5) AG2(-13.5,-11.5) AG3(-12.5,-11.5) AG4(-11.5,-11.5) AG5(-10.5,-11.5) AG6(-9.5,-11.5) AG7(-8.5,-11.5) AG8(-7.5,-11.5) AG9(-6.5,-11.5) AG10(-5.5,-11.5) AG11(-4.5,-11.5) AG12(-3.5,-11.5) AG13(-2.5,-11.5) AG14(-1.5,-11.5) AG15(-0.5,-11.5) AG16(0.5,-11.5) AG17(1.5,-11.5) AG18(2.5,-11.5) AG19(3.5,-11.5) AG20(4.5,-11.5) AG21(5.5,-11.5) AG22(6.5,-11.5) AG23(7.5,-11.5) AG24(8.5,-11.5) AG25(9.5,-11.5) AG26(10.5,-11.5) AG27(11.5,-11.5) AG28(12.5,-11.5) AG29(13.5,-11.5) AG30(14.5,-11.5) AH1(-14.5,-12.5) AH2(-13.5,-12.5) AH3(-12.5,-12.5) AH4(-11.5,-12.5) AH5(-10.5,-12.5) AH6(-9.5,-12.5) AH7(-8.5,-12.5) AH8(-7.5,-12.5) AH9(-6.5,-12.5) AH10(-5.5,-12.5) AH11(-4.5,-12.5) AH12(-3.5,-12.5) AH13(-2.5,-12.5) AH14(-1.5,-12.5) AH15(-0.5,-12.5) AH16(0.5,-12.5) AH17(1.5,-12.5) AH18(2.5,-12.5) AH19(3.5,-12.5) AH20(4.5,-12.5) AH21(5.5,-12.5) AH22(6.5,-12.5) AH23(7.5,-12.5) AH24(8.5,-12.5) AH25(9.5,-12.5) AH26(10.5,-12.5) AH27(11.5,-12.5) AH28(12.5,-12.5) AH29(13.5,-12.5) AH30(14.5,-12.5) AJ1(-14.5,-13.5) AJ2(-13.5,-13.5) AJ3(-12.5,-13.5) AJ4(-11.5,-13.5) AJ5(-10.5,-13.5) AJ6(-9.5,-13.5) AJ7(-8.5,-13.5) AJ8(-7.5,-13.5) AJ9(-6.5,-13.5) AJ10(-5.5,-13.5) AJ11(-4.5,-13.5) AJ12(-3.5,-13.5) AJ13(-2.5,-13.5) AJ14(-1.5,-13.5) AJ15(-0.5,-13.5) AJ16(0.5,-13.5) AJ17(1.5,-13.5) AJ18(2.5,-13.5) AJ19(3.5,-13.5) AJ20(4.5,-13.5) AJ21(5.5,-13.5) AJ22(6.5,-13.5) AJ23(7.5,-13.5) AJ24(8.5,-13.5) AJ25(9.5,-13.5) AJ26(10.5,-13.5) AJ27(11.5,-13.5) AJ28(12.5,-13.5) AJ29(13.5,-13.5) AJ30(14.5,-13.5) AK1(-14.5,-14.5) AK2(-13.5,-14.5) AK3(-12.5,-14.5) AK4(-11.5,-14.5) AK5(-10.5,-14.5) AK6(-9.5,-14.5) AK7(-8.5,-14.5) AK8(-7.5,-14.5) AK9(-6.5,-14.5) AK10(-5.5,-14.5) AK11(-4.5,-14.5) AK12(-3.5,-14.5) AK13(-2.5,-14.5) AK14(-1.5,-14.5) AK15(-0.5,-14.5) AK16(0.5,-14.5) AK17(1.5,-14.5) AK18(2.5,-14.5) AK19(3.5,-14.5) AK20(4.5,-14.5) AK21(5.5,-14.5) AK22(6.5,-14.5) AK23(7.5,-14.5) AK24(8.5,-14.5) AK25(9.5,-14.5) AK26(10.5,-14.5) AK27(11.5,-14.5) AK28(12.5,-14.5) AK29(13.5,-14.5) AK30(14.5,-14.5) B1(-14.5,13.5) B2(-13.5,13.5) B3(-12.5,13.5) B4(-11.5,13.5) B5(-10.5,13.5) B6(-9.5,13.5) B7(-8.5,13.5) B8(-7.5,13.5) B9(-6.5,13.5) B10(-5.5,13.5) B11(-4.5,13.5) B12(-3.5,13.5) B13(-2.5,13.5) B14(-1.5,13.5) B15(-0.5,13.5) B16(0.5,13.5) B17(1.5,13.5) B18(2.5,13.5) B19(3.5,13.5) B20(4.5,13.5) B21(5.5,13.5) B22(6.5,13.5) B23(7.5,13.5) B24(8.5,13.5) B25(9.5,13.5) B26(10.5,13.5) B27(11.5,13.5) B28(12.5,13.5) B29(13.5,13.5) B30(14.5,13.5) C1(-14.5,12.5) C2(-13.5,12.5) C3(-12.5,12.5) C4(-11.5,12.5) C5(-10.5,12.5) C6(-9.5,12.5) C7(-8.5,12.5) C8(-7.5,12.5) C9(-6.5,12.5) C10(-5.5,12.5) C11(-4.5,12.5) C12(-3.5,12.5) C13(-2.5,12.5) C14(-1.5,12.5) C15(-0.5,12.5) C16(0.5,12.5) C17(1.5,12.5) C18(2.5,12.5) C19(3.5,12.5) C20(4.5,12.5) C21(5.5,12.5) C22(6.5,12.5) C23(7.5,12.5) C24(8.5,12.5) C25(9.5,12.5) C26(10.5,12.5) C27(11.5,12.5) C28(12.5,12.5) C29(13.5,12.5) C30(14.5,12.5) D1(-14.5,11.5) D2(-13.5,11.5) D3(-12.5,11.5) D4(-11.5,11.5) D5(-10.5,11.5) D6(-9.5,11.5) D7(-8.5,11.5) D8(-7.5,11.5) D9(-6.5,11.5) D10(-5.5,11.5) D11(-4.5,11.5) D12(-3.5,11.5) D13(-2.5,11.5) D14(-1.5,11.5) D15(-0.5,11.5) D16(0.5,11.5) D17(1.5,11.5) D18(2.5,11.5) D19(3.5,11.5) D20(4.5,11.5) D21(5.5,11.5) D22(6.5,11.5) D23(7.5,11.5) D24(8.5,11.5) D25(9.5,11.5) D26(10.5,11.5) D27(11.5,11.5) D28(12.5,11.5) D29(13.5,11.5) D30(14.5,11.5) E1(-14.5,10.5) E2(-13.5,10.5) E3(-12.5,10.5) E4(-11.5,10.5) E5(-10.5,10.5) E6(-9.5,10.5) E7(-8.5,10.5) E8(-7.5,10.5) E9(-6.5,10.5) E10(-5.5,10.5) E11(-4.5,10.5) E12(-3.5,10.5) E13(-2.5,10.5) E14(-1.5,10.5) E15(-0.5,10.5) E16(0.5,10.5) E17(1.5,10.5) E18(2.5,10.5) E19(3.5,10.5) E20(4.5,10.5) E21(5.5,10.5) E22(6.5,10.5) E23(7.5,10.5) E24(8.5,10.5) E25(9.5,10.5) E26(10.5,10.5) E27(11.5,10.5) E28(12.5,10.5) E29(13.5,10.5) E30(14.5,10.5) F1(-14.5,9.5) F2(-13.5,9.5) F3(-12.5,9.5) F4(-11.5,9.5) F5(-10.5,9.5) F6(-9.5,9.5) F7(-8.5,9.5) F8(-7.5,9.5) F9(-6.5,9.5) F10(-5.5,9.5) F11(-4.5,9.5) F12(-3.5,9.5) F13(-2.5,9.5) F14(-1.5,9.5) F15(-0.5,9.5) F16(0.5,9.5) F17(1.5,9.5) F18(2.5,9.5) F19(3.5,9.5) F20(4.5,9.5) F21(5.5,9.5) F22(6.5,9.5) F23(7.5,9.5) F24(8.5,9.5) F25(9.5,9.5) F26(10.5,9.5) F27(11.5,9.5) F28(12.5,9.5) F29(13.5,9.5) F30(14.5,9.5) G1(-14.5,8.5) G2(-13.5,8.5) G3(-12.5,8.5) G4(-11.5,8.5) G5(-10.5,8.5) G6(-9.5,8.5) G7(-8.5,8.5) G8(-7.5,8.5) G9(-6.5,8.5) G10(-5.5,8.5) G11(-4.5,8.5) G12(-3.5,8.5) G13(-2.5,8.5) G14(-1.5,8.5) G15(-0.5,8.5) G16(0.5,8.5) G17(1.5,8.5) G18(2.5,8.5) G19(3.5,8.5) G20(4.5,8.5) G21(5.5,8.5) G22(6.5,8.5) G23(7.5,8.5) G24(8.5,8.5) G25(9.5,8.5) G26(10.5,8.5) G27(11.5,8.5) G28(12.5,8.5) G29(13.5,8.5) G30(14.5,8.5) H1(-14.5,7.5) H2(-13.5,7.5) H3(-12.5,7.5) H4(-11.5,7.5) H5(-10.5,7.5) H6(-9.5,7.5) H7(-8.5,7.5) H8(-7.5,7.5) H9(-6.5,7.5) H10(-5.5,7.5) H11(-4.5,7.5) H12(-3.5,7.5) H13(-2.5,7.5) H14(-1.5,7.5) H15(-0.5,7.5) H16(0.5,7.5) H17(1.5,7.5) H18(2.5,7.5) H19(3.5,7.5) H20(4.5,7.5) H21(5.5,7.5) H22(6.5,7.5) H23(7.5,7.5) H24(8.5,7.5) H25(9.5,7.5) H26(10.5,7.5) H27(11.5,7.5) H28(12.5,7.5) H29(13.5,7.5) H30(14.5,7.5) J1(-14.5,6.5) J2(-13.5,6.5) J3(-12.5,6.5) J4(-11.5,6.5) J5(-10.5,6.5) J6(-9.5,6.5) J7(-8.5,6.5) J8(-7.5,6.5) J9(-6.5,6.5) J10(-5.5,6.5) J11(-4.5,6.5) J12(-3.5,6.5) J13(-2.5,6.5) J14(-1.5,6.5) J15(-0.5,6.5) J16(0.5,6.5) J17(1.5,6.5) J18(2.5,6.5) J19(3.5,6.5) J20(4.5,6.5) J21(5.5,6.5) J22(6.5,6.5) J23(7.5,6.5) J24(8.5,6.5) J25(9.5,6.5) J26(10.5,6.5) J27(11.5,6.5) J28(12.5,6.5) J29(13.5,6.5) J30(14.5,6.5) K1(-14.5,5.5) K2(-13.5,5.5) K3(-12.5,5.5) K4(-11.5,5.5) K5(-10.5,5.5) K6(-9.5,5.5) K7(-8.5,5.5) K8(-7.5,5.5) K9(-6.5,5.5) K10(-5.5,5.5) K11(-4.5,5.5) K12(-3.5,5.5) K13(-2.5,5.5) K14(-1.5,5.5) K15(-0.5,5.5) K16(0.5,5.5) K17(1.5,5.5) K18(2.5,5.5) K19(3.5,5.5) K20(4.5,5.5) K21(5.5,5.5) K22(6.5,5.5) K23(7.5,5.5) K24(8.5,5.5) K25(9.5,5.5) K26(10.5,5.5) K27(11.5,5.5) K28(12.5,5.5) K29(13.5,5.5) K30(14.5,5.5) L1(-14.5,4.5) L2(-13.5,4.5) L3(-12.5,4.5) L4(-11.5,4.5) L5(-10.5,4.5) L6(-9.5,4.5) L7(-8.5,4.5) L8(-7.5,4.5) L9(-6.5,4.5) L10(-5.5,4.5) L11(-4.5,4.5) L12(-3.5,4.5) L13(-2.5,4.5) L14(-1.5,4.5) L15(-0.5,4.5) L16(0.5,4.5) L17(1.5,4.5) L18(2.5,4.5) L19(3.5,4.5) L20(4.5,4.5) L21(5.5,4.5) L22(6.5,4.5) L23(7.5,4.5) L24(8.5,4.5) L25(9.5,4.5) L26(10.5,4.5) L27(11.5,4.5) L28(12.5,4.5) L29(13.5,4.5) L30(14.5,4.5) M1(-14.5,3.5) M2(-13.5,3.5) M3(-12.5,3.5) M4(-11.5,3.5) M5(-10.5,3.5) M6(-9.5,3.5) M7(-8.5,3.5) M8(-7.5,3.5) M9(-6.5,3.5) M10(-5.5,3.5) M11(-4.5,3.5) M12(-3.5,3.5) M13(-2.5,3.5) M14(-1.5,3.5) M15(-0.5,3.5) M16(0.5,3.5) M17(1.5,3.5) M18(2.5,3.5) M19(3.5,3.5) M20(4.5,3.5) M21(5.5,3.5) M22(6.5,3.5) M23(7.5,3.5) M24(8.5,3.5) M25(9.5,3.5) M26(10.5,3.5) M27(11.5,3.5) M28(12.5,3.5) M29(13.5,3.5) M30(14.5,3.5) N1(-14.5,2.5) N2(-13.5,2.5) N3(-12.5,2.5) N4(-11.5,2.5) N5(-10.5,2.5) N6(-9.5,2.5) N7(-8.5,2.5) N8(-7.5,2.5) N9(-6.5,2.5) N10(-5.5,2.5) N11(-4.5,2.5) N12(-3.5,2.5) N13(-2.5,2.5) N14(-1.5,2.5) N15(-0.5,2.5) N16(0.5,2.5) N17(1.5,2.5) N18(2.5,2.5) N19(3.5,2.5) N20(4.5,2.5) N21(5.5,2.5) N22(6.5,2.5) N23(7.5,2.5) N24(8.5,2.5) N25(9.5,2.5) N26(10.5,2.5) N27(11.5,2.5) N28(12.5,2.5) N29(13.5,2.5) N30(14.5,2.5) P1(-14.5,1.5) P2(-13.5,1.5) P3(-12.5,1.5) P4(-11.5,1.5) P5(-10.5,1.5) P6(-9.5,1.5) P7(-8.5,1.5) P8(-7.5,1.5) P9(-6.5,1.5) P10(-5.5,1.5) P11(-4.5,1.5) P12(-3.5,1.5) P13(-2.5,1.5) P14(-1.5,1.5) P15(-0.5,1.5) P16(0.5,1.5) P17(1.5,1.5) P18(2.5,1.5) P19(3.5,1.5) P20(4.5,1.5) P21(5.5,1.5) P22(6.5,1.5) P23(7.5,1.5) P24(8.5,1.5) P25(9.5,1.5) P26(10.5,1.5) P27(11.5,1.5) P28(12.5,1.5) P29(13.5,1.5) P30(14.5,1.5) R1(-14.5,0.5) R2(-13.5,0.5) R3(-12.5,0.5) R4(-11.5,0.5) R5(-10.5,0.5) R6(-9.5,0.5) R7(-8.5,0.5) R8(-7.5,0.5) R9(-6.5,0.5) R10(-5.5,0.5) R11(-4.5,0.5) R12(-3.5,0.5) R13(-2.5,0.5) R14(-1.5,0.5) R15(-0.5,0.5) R16(0.5,0.5) R17(1.5,0.5) R18(2.5,0.5) R19(3.5,0.5) R20(4.5,0.5) R21(5.5,0.5) R22(6.5,0.5) R23(7.5,0.5) R24(8.5,0.5) R25(9.5,0.5) R26(10.5,0.5) R27(11.5,0.5) R28(12.5,0.5) R29(13.5,0.5) R30(14.5,0.5) T1(-14.5,-0.5) T2(-13.5,-0.5) T3(-12.5,-0.5) T4(-11.5,-0.5) T5(-10.5,-0.5) T6(-9.5,-0.5) T7(-8.5,-0.5) T8(-7.5,-0.5) T9(-6.5,-0.5) T10(-5.5,-0.5) T11(-4.5,-0.5) T12(-3.5,-0.5) T13(-2.5,-0.5) T14(-1.5,-0.5) T15(-0.5,-0.5) T16(0.5,-0.5) T17(1.5,-0.5) T18(2.5,-0.5) T19(3.5,-0.5) T20(4.5,-0.5) T21(5.5,-0.5) T22(6.5,-0.5) T23(7.5,-0.5) T24(8.5,-0.5) T25(9.5,-0.5) T26(10.5,-0.5) T27(11.5,-0.5) T28(12.5,-0.5) T29(13.5,-0.5) T30(14.5,-0.5) U1(-14.5,-1.5) U2(-13.5,-1.5) U3(-12.5,-1.5) U4(-11.5,-1.5) U5(-10.5,-1.5) U6(-9.5,-1.5) U7(-8.5,-1.5) U8(-7.5,-1.5) U9(-6.5,-1.5) U10(-5.5,-1.5) U11(-4.5,-1.5) U12(-3.5,-1.5) U13(-2.5,-1.5) U14(-1.5,-1.5) U15(-0.5,-1.5) U16(0.5,-1.5) U17(1.5,-1.5) U18(2.5,-1.5) U19(3.5,-1.5) U20(4.5,-1.5) U21(5.5,-1.5) U22(6.5,-1.5) U23(7.5,-1.5) U24(8.5,-1.5) U25(9.5,-1.5) U26(10.5,-1.5) U27(11.5,-1.5) U28(12.5,-1.5) U29(13.5,-1.5) U30(14.5,-1.5) V1(-14.5,-2.5) V2(-13.5,-2.5) V3(-12.5,-2.5) V4(-11.5,-2.5) V5(-10.5,-2.5) V6(-9.5,-2.5) V7(-8.5,-2.5) V8(-7.5,-2.5) V9(-6.5,-2.5) V10(-5.5,-2.5) V11(-4.5,-2.5) V12(-3.5,-2.5) V13(-2.5,-2.5) V14(-1.5,-2.5) V15(-0.5,-2.5) V16(0.5,-2.5) V17(1.5,-2.5) V18(2.5,-2.5) V19(3.5,-2.5) V20(4.5,-2.5) V21(5.5,-2.5) V22(6.5,-2.5) V23(7.5,-2.5) V24(8.5,-2.5) V25(9.5,-2.5) V26(10.5,-2.5) V27(11.5,-2.5) V28(12.5,-2.5) V29(13.5,-2.5) V30(14.5,-2.5) W1(-14.5,-3.5) W2(-13.5,-3.5) W3(-12.5,-3.5) W4(-11.5,-3.5) W5(-10.5,-3.5) W6(-9.5,-3.5) W7(-8.5,-3.5) W8(-7.5,-3.5) W9(-6.5,-3.5) W10(-5.5,-3.5) W11(-4.5,-3.5) W12(-3.5,-3.5) W13(-2.5,-3.5) W14(-1.5,-3.5) W15(-0.5,-3.5) W16(0.5,-3.5) W17(1.5,-3.5) W18(2.5,-3.5) W19(3.5,-3.5) W20(4.5,-3.5) W21(5.5,-3.5) W22(6.5,-3.5) W23(7.5,-3.5) W24(8.5,-3.5) W25(9.5,-3.5) W26(10.5,-3.5) W27(11.5,-3.5) W28(12.5,-3.5) W29(13.5,-3.5) W30(14.5,-3.5) Y1(-14.5,-4.5) Y2(-13.5,-4.5) Y3(-12.5,-4.5) Y4(-11.5,-4.5) Y5(-10.5,-4.5) Y6(-9.5,-4.5) Y7(-8.5,-4.5) Y8(-7.5,-4.5) Y9(-6.5,-4.5) Y10(-5.5,-4.5) Y11(-4.5,-4.5) Y12(-3.5,-4.5) Y13(-2.5,-4.5) Y14(-1.5,-4.5) Y15(-0.5,-4.5) Y16(0.5,-4.5) Y17(1.5,-4.5) Y18(2.5,-4.5) Y19(3.5,-4.5) Y20(4.5,-4.5) Y21(5.5,-4.5) Y22(6.5,-4.5) Y23(7.5,-4.5) Y24(8.5,-4.5) Y25(9.5,-4.5) Y26(10.5,-4.5) Y27(11.5,-4.5) Y28(12.5,-4.5) Y29(13.5,-4.5) Y30(14.5,-4.5)
  silkscreen extent -16.1,-15.5 15.5,15.5, body extent -15.5,-15.5 15.5,15.5, height 3.35
INDUC_SMD [mm]
  rect 2x5 smd: 1(-6.096,-0.508) 2(6.096,-0.508)
  rect 5.3x12.4 smd: 1(-3.556,-0.254) 2(3.556,-0.254)
  Top Layer pour cut-out: -8.128,5.969 -8.128,-6.481 8.255,-6.481 8.255,5.969
  silkscreen extent -7.23,-6.48 7.24,5.97, body extent -6.16,-6.46 6.16,5.84, height 8.16
IS61LV256 [mm]
  rect 2x0.35 smd: 1(-5.969,8.063)
  oval 2x0.35 smd: 2(-5.969,7.263) 3(-5.969,6.463) 4(-5.969,5.663) 5(-5.969,4.863) 6(-5.969,4.063) 7(-5.969,3.263) 8(-5.969,2.463) 9(-5.969,1.663) 10(-5.969,0.863) 11(-5.969,0.063) 12(-5.969,-0.737) 13(-5.969,-1.537) 14(-5.969,-2.337) 15(-5.969,-3.137) 16(-5.969,-3.937) 17(-5.969,-4.737) 18(-5.969,-5.537) 19(-5.969,-6.337) 20(-5.969,-7.137) 21(-5.969,-7.937) 22(-5.969,-8.737) 23(5.831,-8.737) 24(5.831,-7.937) 25(5.831,-7.137) 26(5.831,-6.337) 27(5.831,-5.537) 28(5.831,-4.737) 29(5.831,-3.937) 30(5.831,-3.137) 31(5.831,-2.337) 32(5.831,-1.537) 33(5.831,-0.737) 34(5.831,0.063) 35(5.831,0.863) 36(5.831,1.663) 37(5.831,2.463) 38(5.831,3.263) 39(5.831,4.063) 40(5.831,4.863) 41(5.831,5.663) 42(5.831,6.463) 43(5.831,7.263) 44(5.831,8.063)
  silkscreen extent -4.13,-9.14 4,8.46, body extent -5.86,-9.46 5.8,8.89, height 1.2
LCD2x16_3d [mm]
  round 0 hole 4: 0(-53.575,-16.2) 0(-53.575,14.725) 0(21.35,-16.2) 0(21.35,14.725)
  round 2 hole 1: 1(-48.55,14.725) 2(-46,14.725) 3(-43.475,14.725) 4(-40.925,14.725) 5(-38.4,14.725) 6(-35.85,14.725) 7(-33.3,14.725) 8(-30.75,14.725) 9(-28.2,14.725) 10(-25.675,14.725) 11(-23.125,14.725) 12(-20.6,14.725) 13(-18.05,14.725) 14(-15.5,14.725) 15(-12.925,14.725) 16(-10.375,14.725)
  silkscreen extent -56.57,-19.32 24.48,17.65, body extent -56.15,-19 23.85,17, height 24.8
LM2576_SMD [mm]
  rect 1.05x3.2 smd: 1(-3.4,-9.048) 2(-1.7,-9.048) 3(0,-9.048) 4(1.7,-9.048) 5(3.4,-9.048)
  rect 10.45x8.3 smd: 6(0,0.402)
  Top Layer pour cut-out: -5.588,4.826 -5.588,-10.795 2.794,-10.795 2.794,-6.35 5.461,-6.35 5.461,4.826
  silkscreen extent -5.2,-9.17 5.2,-4.15, body extent -5.2,-6.4 5.2,3, height 4.65
LQFP64_L [mm] "Thin QFP, 64-Leads, Body 10x10mm, Pitch 0.5mm, IPC High Density"
  oval 1.55x0.25 smd: 1(-5.525,3.75) 2(-5.525,3.25) 3(-5.525,2.75) 4(-5.525,2.25) 5(-5.525,1.75) 6(-5.525,1.25) 7(-5.525,0.75) 8(-5.525,0.25) 9(-5.525,-0.25) 10(-5.525,-0.75) 11(-5.525,-1.25) 12(-5.525,-1.75) 13(-5.525,-2.25) 14(-5.525,-2.75) 15(-5.525,-3.25) 16(-5.525,-3.75) 33(5.525,-3.75) 34(5.525,-3.25) 35(5.525,-2.75) 36(5.525,-2.25) 37(5.525,-1.75) 38(5.525,-1.25) 39(5.525,-0.75) 40(5.525,-0.25) 41(5.525,0.25) 42(5.525,0.75) 43(5.525,1.25) 44(5.525,1.75) 45(5.525,2.25) 46(5.525,2.75) 47(5.525,3.25) 48(5.525,3.75)
  oval 0.25x1.55 smd: 17(-3.75,-5.525) 18(-3.25,-5.525) 19(-2.75,-5.525) 20(-2.25,-5.525) 21(-1.75,-5.525) 22(-1.25,-5.525) 23(-0.75,-5.525) 24(-0.25,-5.525) 25(0.25,-5.525) 26(0.75,-5.525) 27(1.25,-5.525) 28(1.75,-5.525) 29(2.25,-5.525) 30(2.75,-5.525) 31(3.25,-5.525) 32(3.75,-5.525) 49(3.75,5.525) 50(3.25,5.525) 51(2.75,5.525) 52(2.25,5.525) 53(1.75,5.525) 54(1.25,5.525) 55(0.75,5.525) 56(0.25,5.525) 57(-0.25,5.525) 58(-0.75,5.525) 59(-1.25,5.525) 60(-1.75,5.525) 61(-2.25,5.525) 62(-2.75,5.525) 63(-3.25,5.525) 64(-3.75,5.525)
  silkscreen extent -5.65,-4.35 4.35,4.55, body extent -5,-5 5,5, height 1.6
max3232 [mm]
  rect 2x0.5 smd: 1(-3.175,-0.508)
  oval 2x0.5 smd: 2(-3.175,-1.778) 3(-3.175,-3.048) 4(-3.175,-4.318) 5(-3.175,-5.588) 6(-3.175,-6.858) 7(-3.175,-8.128) 8(-3.175,-9.398) 9(2.025,-9.398) 10(2.025,-8.128) 11(2.025,-6.858) 12(2.025,-5.588) 13(2.025,-4.318) 14(2.025,-3.048) 15(2.025,-1.778) 16(2.025,-0.508)
  silkscreen extent -1.34,-10.03 0.19,0.13, body extent -3.51,-9.9 2.49,0, height 1.75
MINI_USB_NEW [mm]
  rect 0.5x2.3 smd mask+0.04: 1(1.468,-2.626) 2(0.668,-2.626) 3(-0.132,-2.626) 4(-0.932,-2.626) 5(-1.732,-2.626)
  rect 2x2.5 smd: 6(-4.582,-2.526) 7(-4.582,2.974) 8(4.318,-2.526) 9(4.318,2.974)
  round 0.6 hole 1 unplated: MH1(-2.332,-0.026) MH2(2.068,-0.026)
  silkscreen extent -5.08,-4.45 4.82,5.92, body extent -5.08,-3.38 4.82,5.87, height 3.93
OSC_SMD [mm]
  rect 1.8x2.5 smd: 1(1.067,1.404) 2(6.147,1.404) 3(6.147,6.324) 4(1.067,6.324)
  silkscreen extent 0,0 7.2,7.75, body extent 0,1.3 7.2,6.5, height 1.7
RES_B [mm]
  round 1.8 hole 1: 1(-2.667,0) 2(2.54,0)
  silkscreen extent -3.82,-3.18 3.69,3.05, body extent -3.18,-3.18 3.05,3.05, height 4
SMD_805 [mm]
  rect 1.4x1.2 smd: 1(0.025,1.092) 2(0.025,-1.092)
  Top Layer pour cut-out: -0.991,0.508 -0.991,-0.483 1.041,-0.483 1.041,0.508
  silkscreen extent -0.89,-1.91 0.94,1.91, body extent -0.65,-1.15 0.7,1.15, height 0.76
SOIC127P600X175-8N [mil]
  rect 78x22 smd: 1(-93,75) 2(-93,25) 3(-93,-25) 4(-93,-75) 5(93,-75) 6(93,-25) 7(93,25) 8(93,75)
  silkscreen extent -46,-96 46,96
SOIC-SN8_N [mm]
  oval 2.2x0.6 smd: 1(-2.4,1.905) 2(-2.4,0.635) 3(-2.4,-0.635) 4(-2.4,-1.905) 5(2.4,-1.905) 6(2.4,-0.635) 7(2.4,0.635) 8(2.4,1.905)
  silkscreen extent -2.52,-2.5 0.9,2.88, body extent -2,-2.5 2,2.5, height 1.75
SOT223 [mm]
  rect 1.2x2.4 smd: 1(-2.337,-3.302) 2(-0.034,-3.302) 3(2.265,-3.302)
  rect 3.4x2.7 smd: 2(-0.034,3.327)
  Top Layer pour cut-out: -1.981,4.902 -1.981,-4.648 3.708,-4.648 3.708,4.902
  silkscreen extent -3.53,-3.4 3.3,1.25, body extent -3.4,-1.9 3.3,1.8, height 1.7
SPST-2 [mm] "Switch; 2 Leads"
  rect 1.85x1.85 hole 1.1: 1(-2.54,0)
  round 1.85 hole 1.1: 2(2.54,0)
  silkscreen extent -4.89,-1.27 4.28,1.27
TVS [mm]
  rect 3.1x2.5 smd: 1(-0.025,-2.616) 2(-0.025,2.591)
  Top Layer pour cut-out: -1.803,1.321 -1.803,-1.346 1.727,-1.346 1.727,1.321
  silkscreen extent -2.08,-3.99 1.65,3.96, body extent -1.5,-2.76 1.42,2.74, height 2.23
VGA_PORT [mm]
  oval 1.5x2 hole 0.8: 1(4.375,8.2) 2(2.075,8.2) 3(-0.225,8.2) 4(-2.525,8.2) 5(-4.825,8.2) 6(5.55,5.7) 7(3.25,5.7) 8(0.95,5.7) 9(-1.35,5.7) 10(-3.65,5.7) 11(4.4,3.2) 12(2.1,3.2) 13(-0.2,3.2) 14(-2.5,3.2) 15(-4.8,3.2)
  round 6 hole 4: 16(-12.494,5.7) 17(12.006,5.7)
  silkscreen extent -15.68,-11.53 15.33,10.22
VR5 [mm] "Thru-Hole; 3 Leads"
  rect 1.2x1.2 hole 0.7: 1(-2.54,0)
  round 1.2 hole 0.7: 2(0,0) 3(2.54,0)
  silkscreen extent -5.08,-2.54 6.35,2.54
XCF02S [mm]
  rect 2.5x0.38 smd: 1(-3.304,2.849) 2(-3.304,2.199) 3(-3.304,1.549) 4(-3.304,0.899) 5(-3.304,0.249) 6(-3.304,-0.401) 7(-3.304,-1.051) 8(-3.304,-1.701) 9(-3.304,-2.351) 10(-3.304,-3.001) 11(3.202,-3.001) 12(3.202,-2.351) 13(3.202,-1.701) 14(3.202,-1.051) 15(3.202,-0.401) 16(3.202,0.249) 17(3.202,0.899) 18(3.202,1.549) 19(3.202,2.199) 20(3.202,2.849)
  silkscreen extent -3.03,-3.38 1.55,3.7, body extent -2.03,-3.44 1.94,3.41, height 1.3

## Part data
C1 C2 C3 C4: library part "Cap Pol2_1", "Polarized Capacitor (Axial)", LatestRevisionDate=17-Jul-2002, LatestRevisionNote="Re-released for DXP Platform.", PackageDescription="Polarized Capacitor; 2 Leads", PackageReference=POLAR0.8, Published=8-Jun-2000, Publisher="Altium Limited"
C5 C6 C7 C8 C9 C10 C11 C12 C13 C14 C15 C16 C17 C18 C19 C20 C21 C22 C23 C24 C25 C26 C27 C28 C29 C30 C31 C32 C33 C34 C35 C36 C37 C38 C39 C40 C41 C42 C43 C47 C49 C50 C51 C52 C53 C54 C55 C56 C57 C58 C59 C60 C61 C62 C63 C64 C65 C66 C67 C68 C69 C70 C71 C72 C73 C74: "Capacitor", LatestRevisionDate=17-Jul-2002, LatestRevisionNote="Re-released for DXP Platform.", PackageDescription="Radial Cap, Thru-Hole; 2 Leads; 0.3 in Pin Spacing", PackageReference=RAD-0.3, Published=8-Jun-2000, Publisher="Altium Limited"
C44 C45 C46 C48: "Polarized Capacitor (Axial)", LatestRevisionDate=17-Jul-2002, LatestRevisionNote="Re-released for DXP Platform.", PackageDescription="Polarized Capacitor; 2 Leads", PackageReference=POLAR0.8, Published=8-Jun-2000, Publisher="Altium Limited"
D1 D2 D3 D6 D7 D9: "Typical INFRARED GaAs LED", LatestRevisionDate=08-Jul-2005, LatestRevisionNote="Mech Layer 1 removed.", PackageDescription="LED; 2 Leads", PackageReference=LED-0, Published=8-Jun-2000, Publisher="Altium Limited"
D4: "26V, 14V Clamp 17A (8/20Âµs) Ipp Tvs Diode Surface Mount SOT-23-3", Package="SOT-23 Bourns", Availability="In Stock", Check_prices=https://www.snapeda.com/parts/CDSOT23-SM712/Bourns+-+J.W.+Miller/view-part/?ref=eda, MF=Bourns, MP=CDSOT23-SM712, Price=None, Purchase-URL=https://pricing.snapeda.com/search/part/CDSOT23-SM712/?ref=eda, SnapEDA_Link=https://www.snapeda.com/parts/CDSOT23-SM712/Bourns+-+J.W.+Miller/view-part/?ref=snap
D5: library part "Diode 1N4001", "1 Amp General Purpose Rectifier", Code_JEDEC=DO-204-AL, ComponentLink1Description="Manufacturer Link", ComponentLink1URL=http://www.fairchildsemi.com/, ComponentLink2Description=Datasheet, ComponentLink2URL=http://www.fairchildsemi.com/ds/1N%2F1N4001.pdf, DatasheetVersion=1998, LatestRevisionDate=17-Jul-2002, LatestRevisionNote="Re-released for DXP Platform.", PackageDescription="Diode, Axial; Body 5.2 x 2.7 mm (LxDia. max), Lead Dia. 0.86 mm (max)", PackageReference=DO-41, PackageVersion=Aug-1999, Published=8-Jun-2000, Publisher="Altium Limited"
D8: library part "Diode 11DQ03", "Schottky Rectifier", Code_JEDEC=DO-204-AL, ComponentLink1Description="Manufacturer Link", ComponentLink1URL=http://www.irf.com/, ComponentLink2Description=Datasheet, ComponentLink2URL=http://www.irf.com/product-info/datasheets/data/11dq03.pdf, DatasheetVersion=Dec-1997, LatestRevisionDate=17-Jul-2002, LatestRevisionNote="Re-released for DXP Platform.", PackageDescription="Diode, Axial; Body 5.2 x 2.7 mm (LxDia. max), Lead Dia. 0.86 mm (max)", PackageReference=DO-204AL, Published=8-Jun-2000, Publisher="Altium Limited"
F1 F2 F3 F4 F5: library part Inductor, "Inductor", Code_IEC=1005, Code_JEITA=0402, LatestRevisionDate=29-May-2009, LatestRevisionNote="IPC-7351 Footprint Added.", PackageDescription="Chip Inductor", PackageReference=0402-A, Published=8-Jun-2000, Publisher="Altium Limited"
J1 J2: "Receptacle Assembly, 9 Position, Right Angle", PackageDocument=O, DatasheetDocument=1-Sep-1999, Gender=Receptacle, LatestRevisionDate=17-Jul-2002, LatestRevisionNote="Re-released for DXP Platform.", Orientation="Right Angle", PackageReference=788750, Positions=9, Published=15-Jun-2001, Publisher="Altium Limited"
L1: library part Inductor_1, Code_IEC=1005, Code_JEITA=0402, LatestRevisionDate=29-May-2009, LatestRevisionNote="IPC-7351 Footprint Added.", PackageDescription="Chip Inductor", PackageReference=0402-A, Published=8-Jun-2000, Publisher="Altium Limited"
P1: library part "Header 5", "Header, 5-Pin", LatestRevisionDate=17-Jul-2002, LatestRevisionNote="Re-released for DXP Platform.", Publisher="Altium Limited"
P2: "Header, 9-Pin, Dual row", LatestRevisionDate=17-Jul-2002, LatestRevisionNote="Re-released for DXP Platform.", Publisher="Altium Limited"
P3 P4: "Header, 15-Pin, Dual row", LatestRevisionDate=17-Jul-2002, LatestRevisionNote="Re-released for DXP Platform.", Publisher="Altium Limited"
P5: "Header, 5-Pin, Dual row, Right Angle", LatestRevisionDate=17-Jul-2002, LatestRevisionNote="Re-released for DXP Platform.", Publisher="Altium Limited"
P6: library part "Header 9", "Header, 9-Pin", LatestRevisionDate=17-Jul-2002, LatestRevisionNote="Re-released for DXP Platform.", Publisher="Altium Limited"
P7: "Header, 2-Pin", LatestRevisionDate=17-Jul-2002, LatestRevisionNote="Re-released for DXP Platform.", Publisher="Altium Limited"
R1 R2 R3 R4 R5 R6 R7 R8 R9 R10 R11 R12 R13 R14 R15 R16 R17 R18 R19 R20 R21 R22 R23 R24 R25 R26 R27 R28 R29 R30 R31 R32 R33 R34 R35 R36 R37 R38 R39 R40 R41 R43 R44 R45 R46 R47 R48 R49 R50 R51 R52: "Resistor", LatestRevisionDate=17-Jul-2002, LatestRevisionNote="Re-released for DXP Platform.", PackageDescription="Axial Device, Thru-Hole; 2 Leads; 0.3 in Pin Spacing", PackageReference=AXIAL-0.3, Published=8-Jun-2000, Publisher="Altium Limited"
R42: "Potentiometer", LatestRevisionDate=17-Jul-2002, LatestRevisionNote="Re-released for DXP Platform.", PackageDescription="Variable Resistor, Thru-Hole; 3 Leads", PackageReference=VR5, Published=8-Jun-2000, Publisher="Altium Limited", Set Position=0.5, Sim Note="Enter the Resistance value and the set point into parameter fields."
S1 S2 S3 S4 S6 S7: "Switch", LatestRevisionDate=17-Jul-2002, LatestRevisionNote="Re-released for DXP Platform.", PackageDescription="Switch; 2 Leads", PackageReference=SPST-2, Published=24-Mar-1999, Publisher="Altium Limited"
S5 S8: "Single-Pole, Single-Throw Switch", LatestRevisionDate=17-Jul-2002, LatestRevisionNote="Re-released for DXP Platform.", PackageDescription="Switch; 2 Leads", PackageReference=SPST-2, Published=24-Mar-1999, Publisher="Altium Limited"
S9: "DIP Switch, 8 Position, SPST", LatestRevisionDate=17-Jul-2002, LatestRevisionNote="Re-released for DXP Platform.", PackageDescription="DIP Switch; 16 Leads", PackageReference=DIP_SW_8WAY_SMD, Published=24-Mar-1999, Publisher="Altium Limited"
U2: "Dual ARMÂ® CortexÂ®-A9 MPCoreâ„¢ with CoreSightâ„¢ System On Chip (SOC) IC ZynqÂ®-7000 Kintexâ„¢-7 FPGA, 350K Logic Cells 800MHz 900-FCBGA (31x31)", Package="BBGA-900 Xilinx", Availability="In Stock", Check_prices=https://www.snapeda.com/parts/XC7Z045-2FFG900I/Xilinx+Inc./view-part/?ref=eda, MF="Xilinx Inc.", MP=XC7Z045-2FFG900I, Price=None, Purchase-URL=https://pricing.snapeda.com/search/part/XC7Z045-2FFG900I/?ref=eda, SnapEDA_Link=https://www.snapeda.com/parts/XC7Z045-2FFG900I/Xilinx+Inc./view-part/?ref=snap
U3: "ARMÂ® CortexÂ®-M3 STM32F1 Microcontroller IC 32-Bit 72MHz 128KB (128K x 8) FLASH 64-LQFP (10x10)", Package="LQFP-64 STMicroelectronics", Availability="In Stock", Check_prices=https://www.snapeda.com/parts/STM32F103RBT6/STMicroelectronics/view-part/?ref=eda, MF=STMicroelectronics, MP=STM32F103RBT6, Price=None, Purchase-URL=https://pricing.snapeda.com/search?q=STM32F103RBT6&ref=eda, SnapEDA_Link=https://www.snapeda.com/parts/STM32F103RBT6/STMicroelectronics/view-part/?ref=snap
U4: Mfr_Name="Xilinx Inc", RefDes=RefDes, Type=Type
U5: "1/1 Transceiver Half RS422, RS485 8-SOIC", Package="SOIC-8 Maxim", Availability="In Stock", Check_prices=https://www.snapeda.com/parts/MAX485ESA/Maxim+Integrated/view-part/?ref=eda, MF="Maxim Integrated", MP=MAX485ESA, Price=None, Purchase-URL=https://pricing.snapeda.com/search/part/MAX485ESA/?ref=eda, SnapEDA_Link=https://www.snapeda.com/parts/MAX485ESA/Maxim+Integrated/view-part/?ref=snap
U6: "3.0V TO 5.5V, Low-Power, up to 1Mbps, True RS-232 Transceiver Using Four 0.1µF External Capacitor", Code_JEDEC=MS-001-BB, ComponentLink1Description="Manufacturer Link", ComponentLink1URL=http://www.maxim-ic.com/, ComponentLink2Description=Datasheet, ComponentLink2URL=http://pdfserv.maxim-ic.com/en/ds/MAX3222-MAX3241.pdf, DatasheetVersion=Mar-1999, LatestRevisionDate=29-May-2009, LatestRevisionNote="Component Body Added.", PackageDescription="DIP, 16-Pin, Row Spacing 7.62 mm, Pitch 2.54 mm", PackageReference=PE16, PackageVersion=Aug-2000, Published=16-Jan-2001, Publisher="Altium Limited"
U8: "No Description Available", Mfr_Name="Texas Instruments", RefDes=RefDes, Type=Type
U9: "Dual High Speed USB To Multipurpose UART/FIFO IC, 64-pin LQFP, Tape and Reel", Manufacturer=FTDI, ComponentLink1Description="Manufacturer URL", ComponentLink1URL=http://www.ftdichip.com/, ComponentLink2Description=Datasheet, ComponentLink2URL=http://www.ftdichip.com/Support/Documents/DataSheets/ICs/DS_FT2232H.pdf, DatasheetVersion="ver 2.21, Jun-2012", PackageDescription="64-Pin Thin Quad Flat Pack, 10 x 10 x 1.4 mm Body, 0.5 mm Pitch", PackageReference=LQFP-64, PackageVersion=Jun-12, PartNumber=FT2232HL-Reel
U11: "1K, 128x8-bit, 2.5V Microwire Serial EEPROM, 8-Pin SOIC 150mil, Extended Temperature", Code_IPC=SOIC127P600-8, Code_JEDEC=MS-012, ComponentLink1Description="Manufacturer Link", ComponentLink1URL=http://www.microchip.com, ComponentLink2Description=Datasheet, ComponentLink2URL=http://ww1.microchip.com/downloads/en/DeviceDoc/21749G.pdf, ComponentLink3Description="Packaging Specification", ComponentLink3URL=http://ww1.microchip.com/downloads/en/PackagingSpec/00049AW.pdf, DatasheetVersion="revG, May-2008", PackageDescription="8-Lead Plastic Small Outline (SN) - Narrow, 3.90mm Body [SOIC]", PackageReference=SOIC-SN8, PackageVersion="revAW, Oct-2008", Published=29-Jan-2009, Publisher="Altium Limited"
VGA1: "Receptacle Assembly, 15-Pin, Sim Line Connector", PackageDocument=B, DatasheetDocument=24-Nov-1999, Gender="Receptacle Header", LatestRevisionDate=17-Jul-2002, LatestRevisionNote="Re-released for DXP Platform.", Orientation="Right Angle", PackageReference=788574, Positions=15, Published=15-Jun-2001, Publisher="Altium Limited"
Y1: library part XTAL_1, "Crystal Oscillator", LatestRevisionDate=17-Jul-2002, LatestRevisionNote="Re-released for DXP Platform.", PackageDescription="Crystal, Thru-Hole; 2 Leads; Body 3.1 x 8.2 mm (Dia.xH)", PackageReference=R38, Published=8-Jun-2000, Publisher="Altium Limited"
Y2: library part XTAL, "Crystal Oscillator", LatestRevisionDate=17-Jul-2002, LatestRevisionNote="Re-released for DXP Platform.", PackageDescription="Crystal, Thru-Hole; 2 Leads; Body 3.1 x 8.2 mm (Dia.xH)", PackageReference=R38, Published=8-Jun-2000, Publisher="Altium Limited"
OSC1: Designer="Mohammad Ansari"

## Via types
v1: diameter 0.5, hole 0.3, Top Layer to Bottom Layer, 94 vias
v2: diameter 0.5, hole 0.3, Top Layer to Layer 2, 55 vias
v3: diameter 0.5, hole 0.3, Top Layer to Layer 1, 39 vias

## Nets (pads, with @x,y where several pads share a name; then routed paths per layer and width w, separated by ;. In a path a pad name is that pad's centre, name@x,y a point inside that pad or via, vN(x,y) a via of type N, cw(c..) or ccw(c..) an arc to the next point about the centre after c; other vN are vias at no path point)
1V2: C3.1 C10.2 C58.2 C59.2 C60.2 C61.2 C62.2 C63.2 C64.2 C65.2 C66.2 C67.2 C68.2 C69.2 C70.2 R5.2 U2.M13 U2.M15 U2.N12 U2.N14 U2.P13 U2.R12 U2.R16 U2.T13 U2.U12 U2.U16 U2.V13 U2.V15 U2.V17 U2.V19 U2.W12 U2.W14 U2.W16 U2.W18 U2.W20 U2.Y17 VR3.2
1V8: C4.1 C12.2 C40.1 C41.1 C52.2 C57.2 C71.2 C72.2 C73.2 R6.2 U2.M11 U2.N10 U2.N20 U2.P11 U2.P19 U2.R10 U2.R20 U2.T11 U2.U10 U2.U20 U2.V11 U2.W10 U2.Y11 U9.12 U9.37 U9.49 U9.64 VR4.2 | length 9.7
  Top Layer w0.25: U9.12@57.947,23.846 58.733,23.846 61.096,26.208 61.096,27.73 60.496,28.33 60.404,28.33 59.947,28.787 59.947,29.905 59.722,30.13 U9.64@59.722,31.121
2V5: C1.1 C6.2 D1.1 P4.28 VR1.2